# Altium PCB 数控电源.PcbDoc (part 1 of 4)
Units mm, origin at the board's own origin, x right, y up, seen from the top; angles counter-clockwise.
Board outline 99.32 x 99.37 mm, 4 copper layers (Top Layer 1, GND, POWER, Bottom Layer), stack 0.603 mm thick; 325 components, 180 nets, 929 pads, 616 vias.
Unrouted connection lines stored in the file: 13.
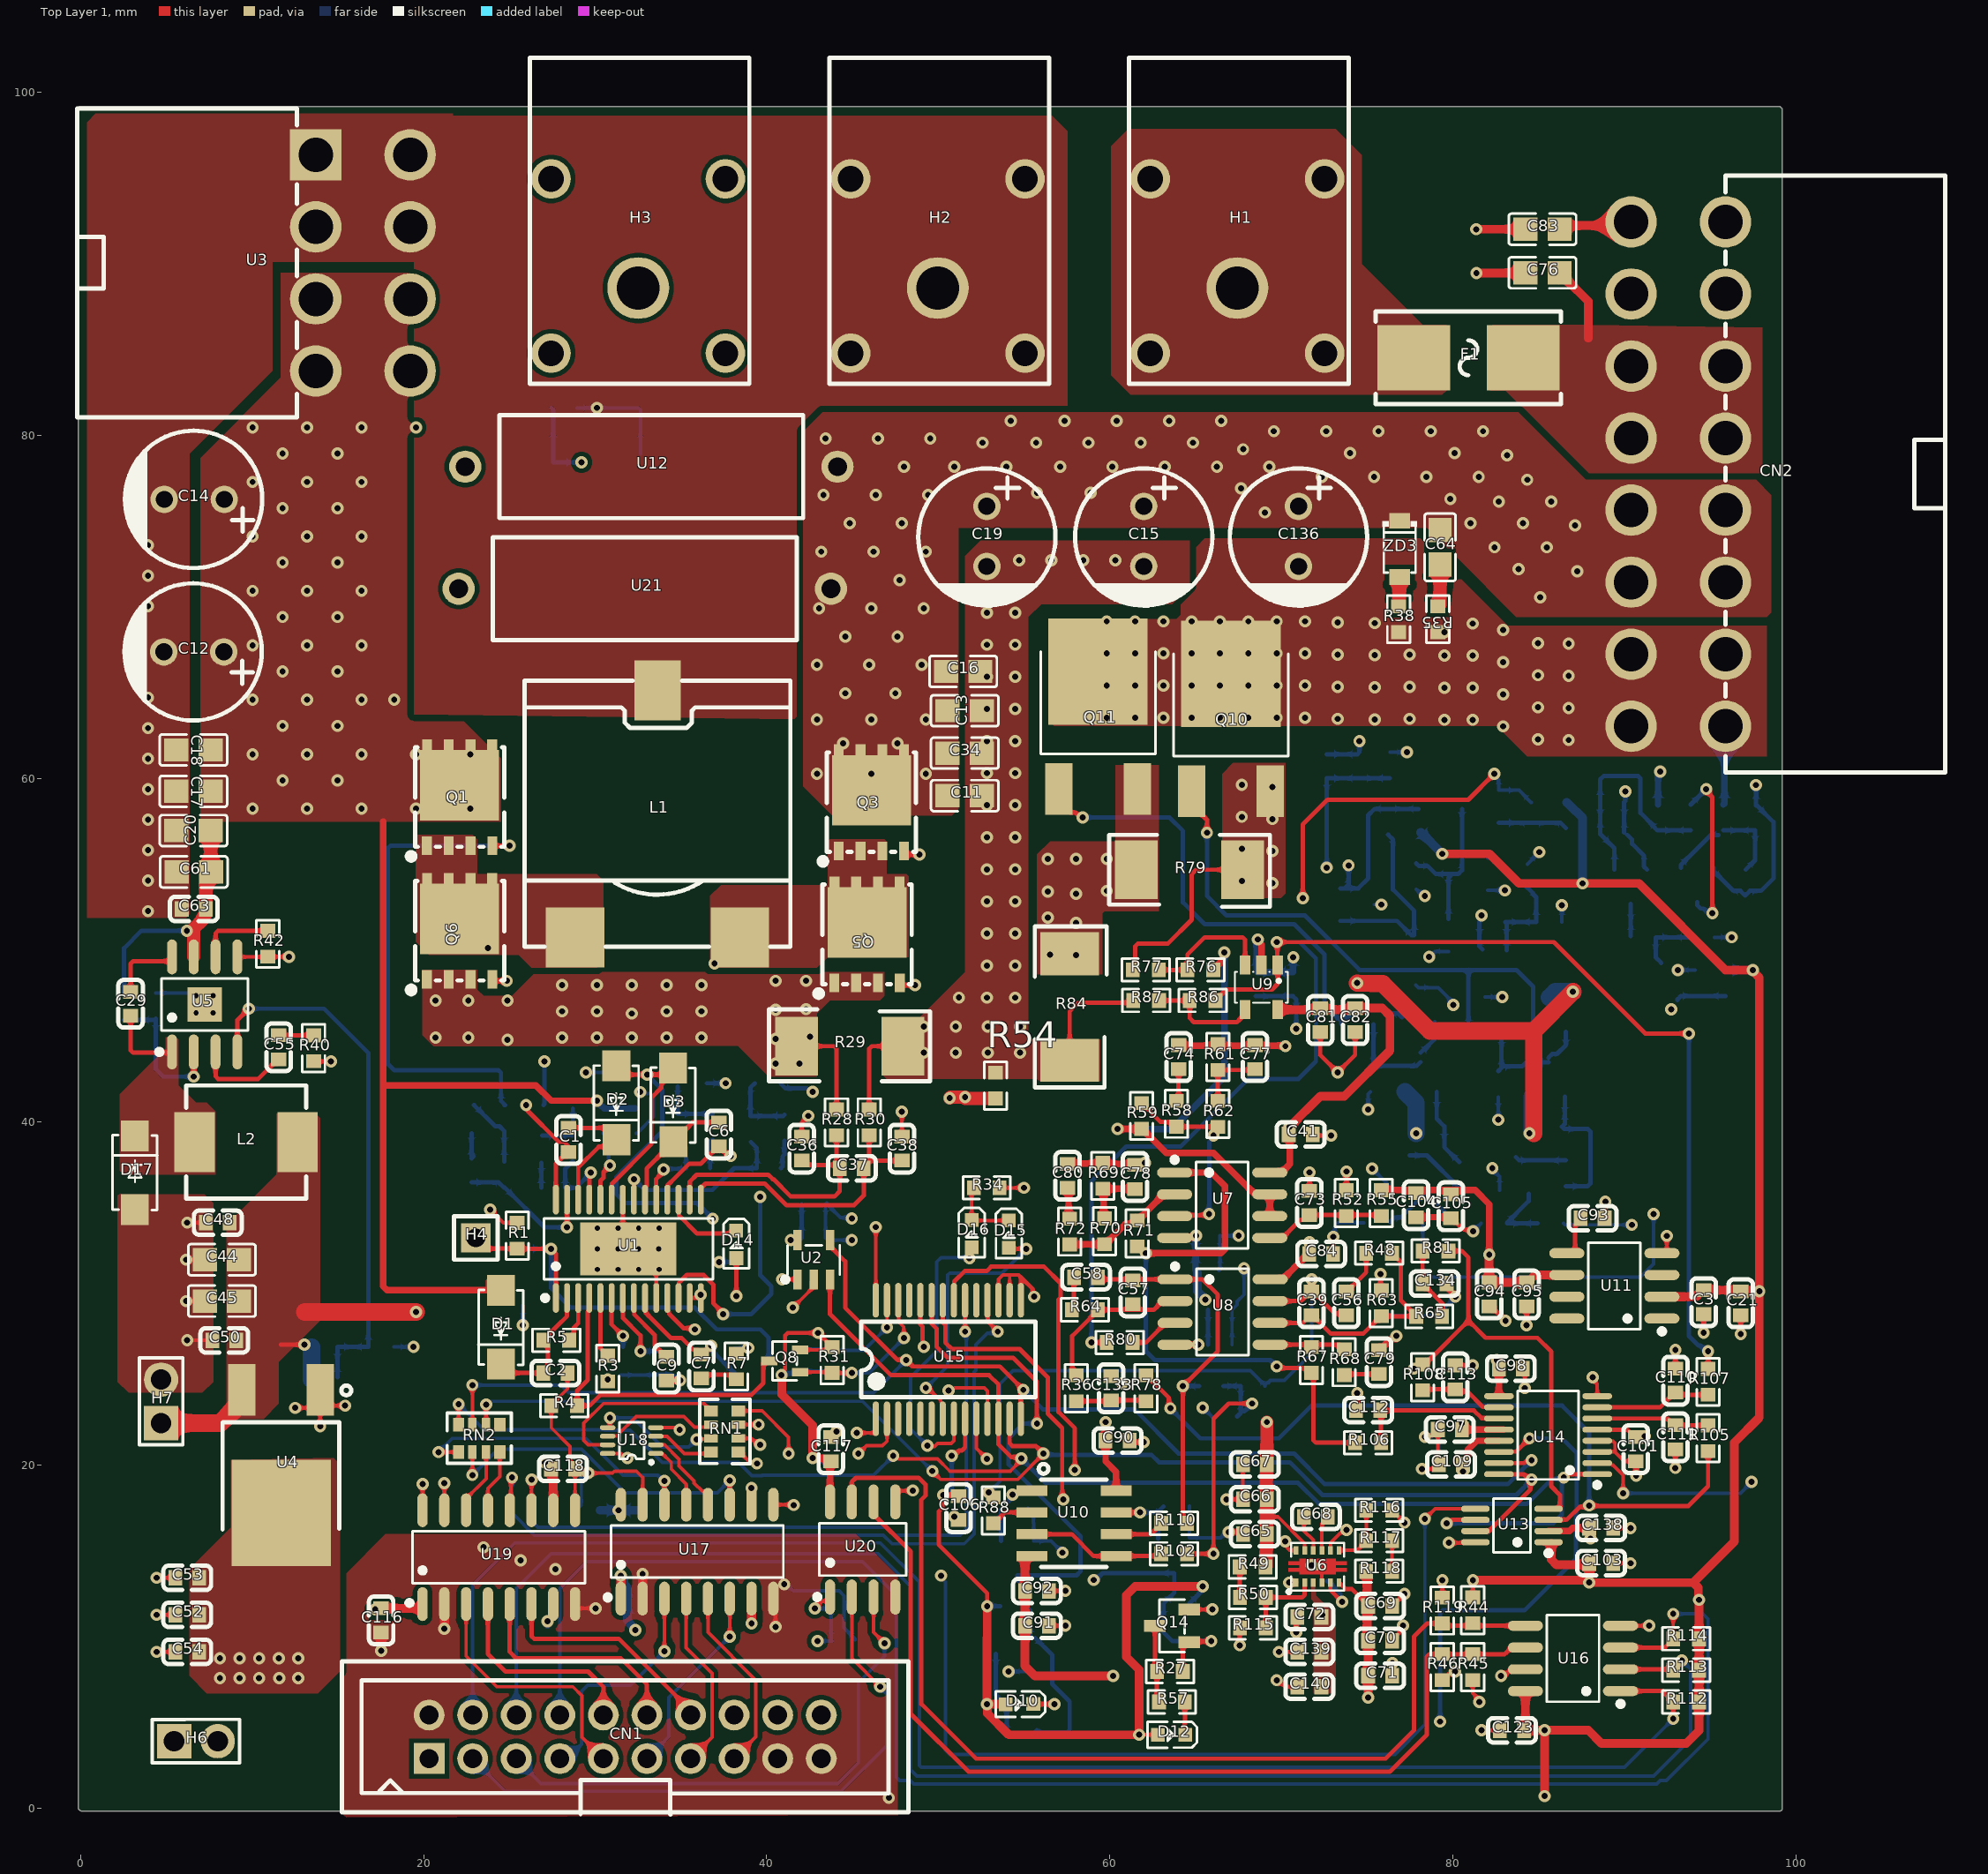
[diagram p0: Top Layer 1 view]
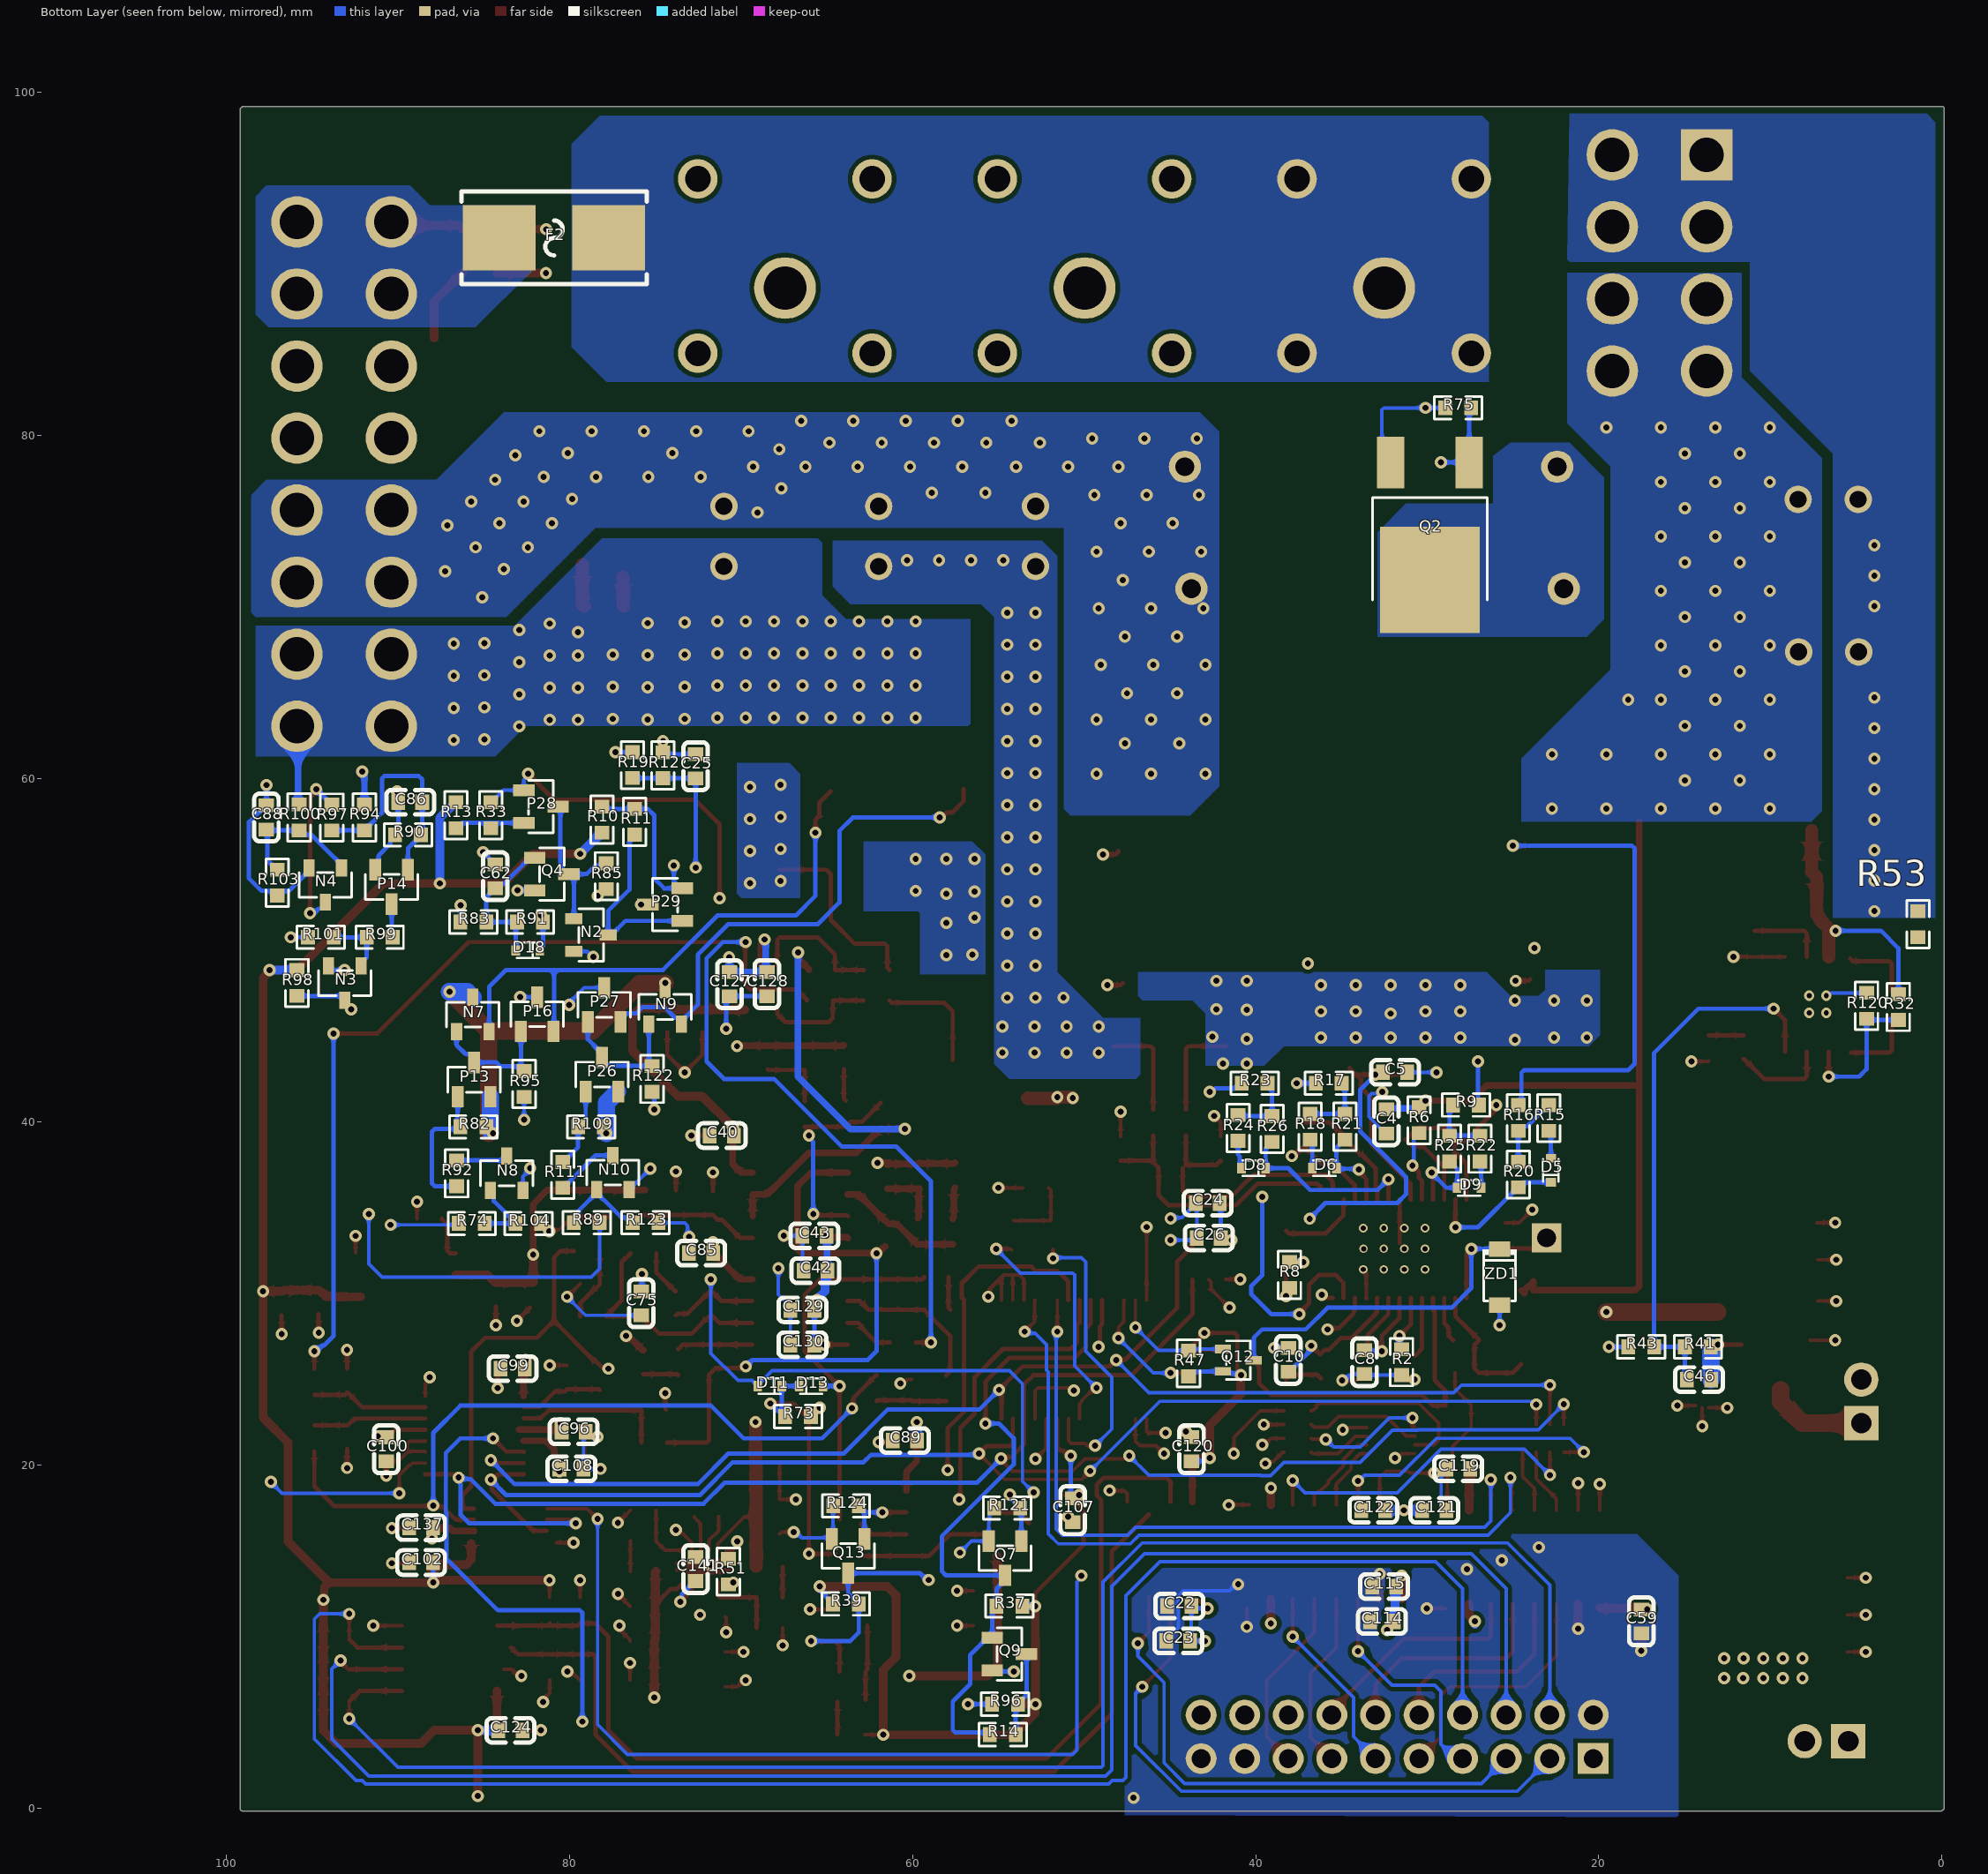
[diagram p1: Bottom Layer view, seen from below]
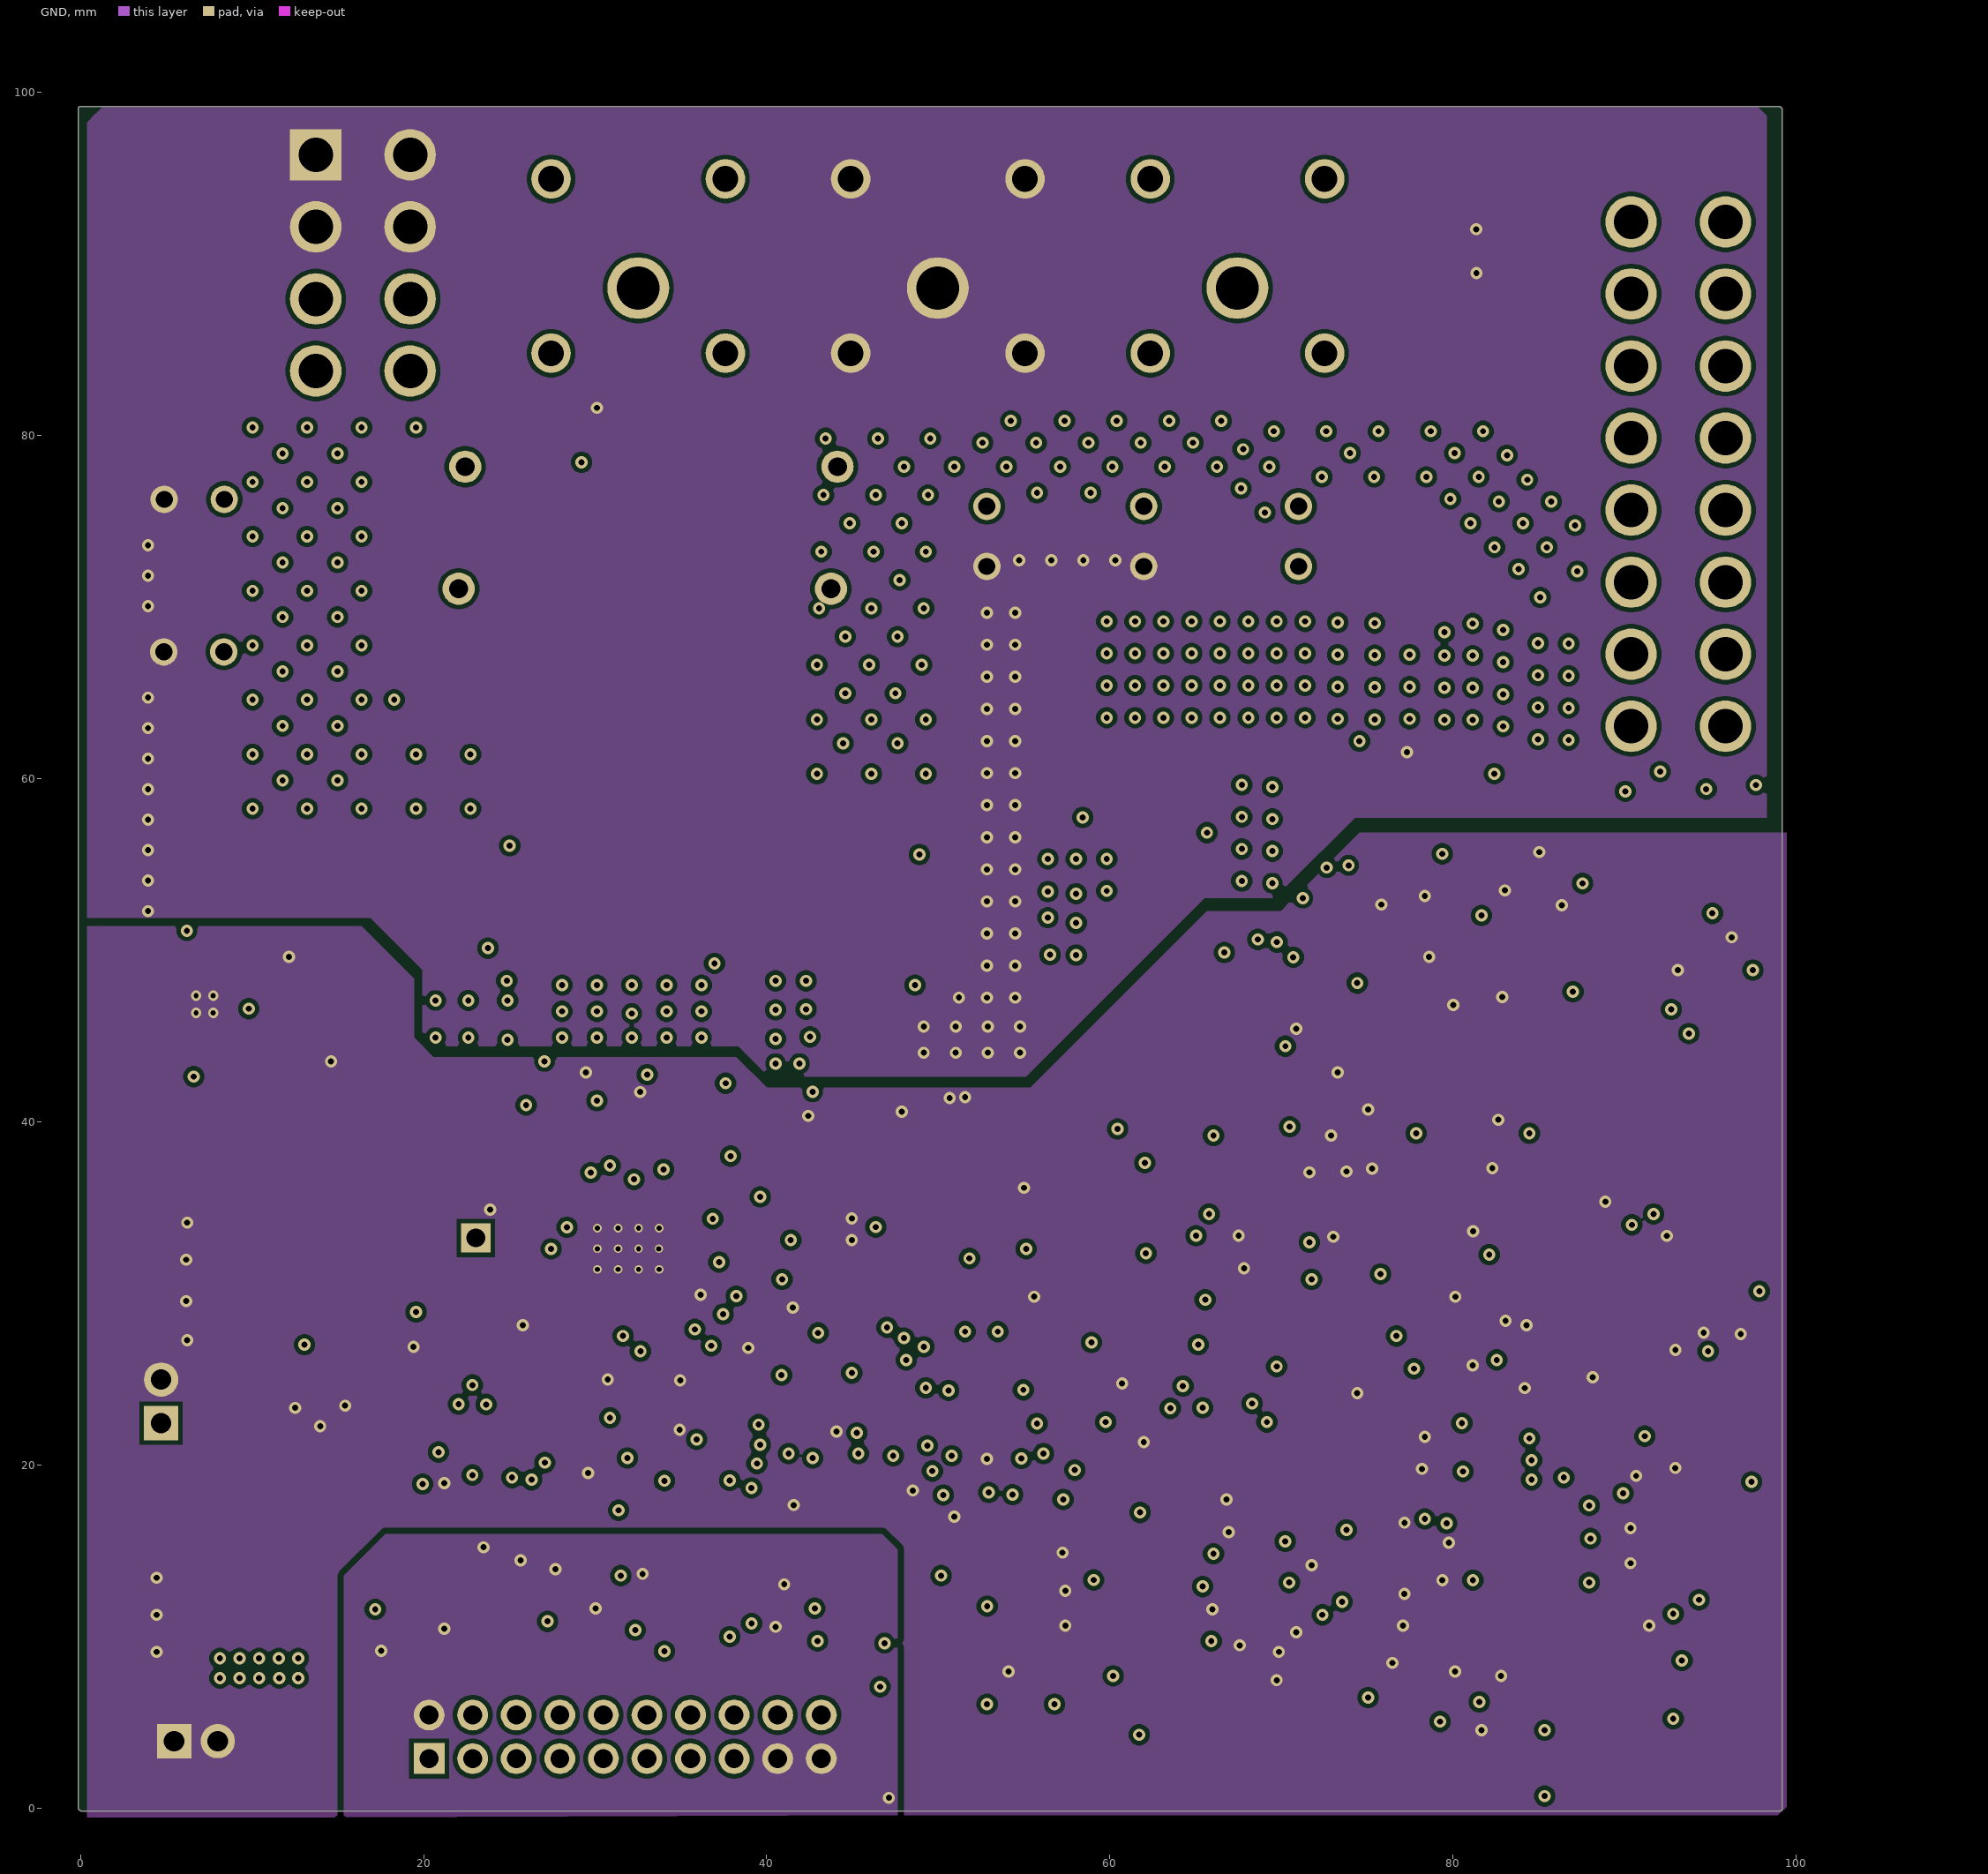
[diagram p2: GND]
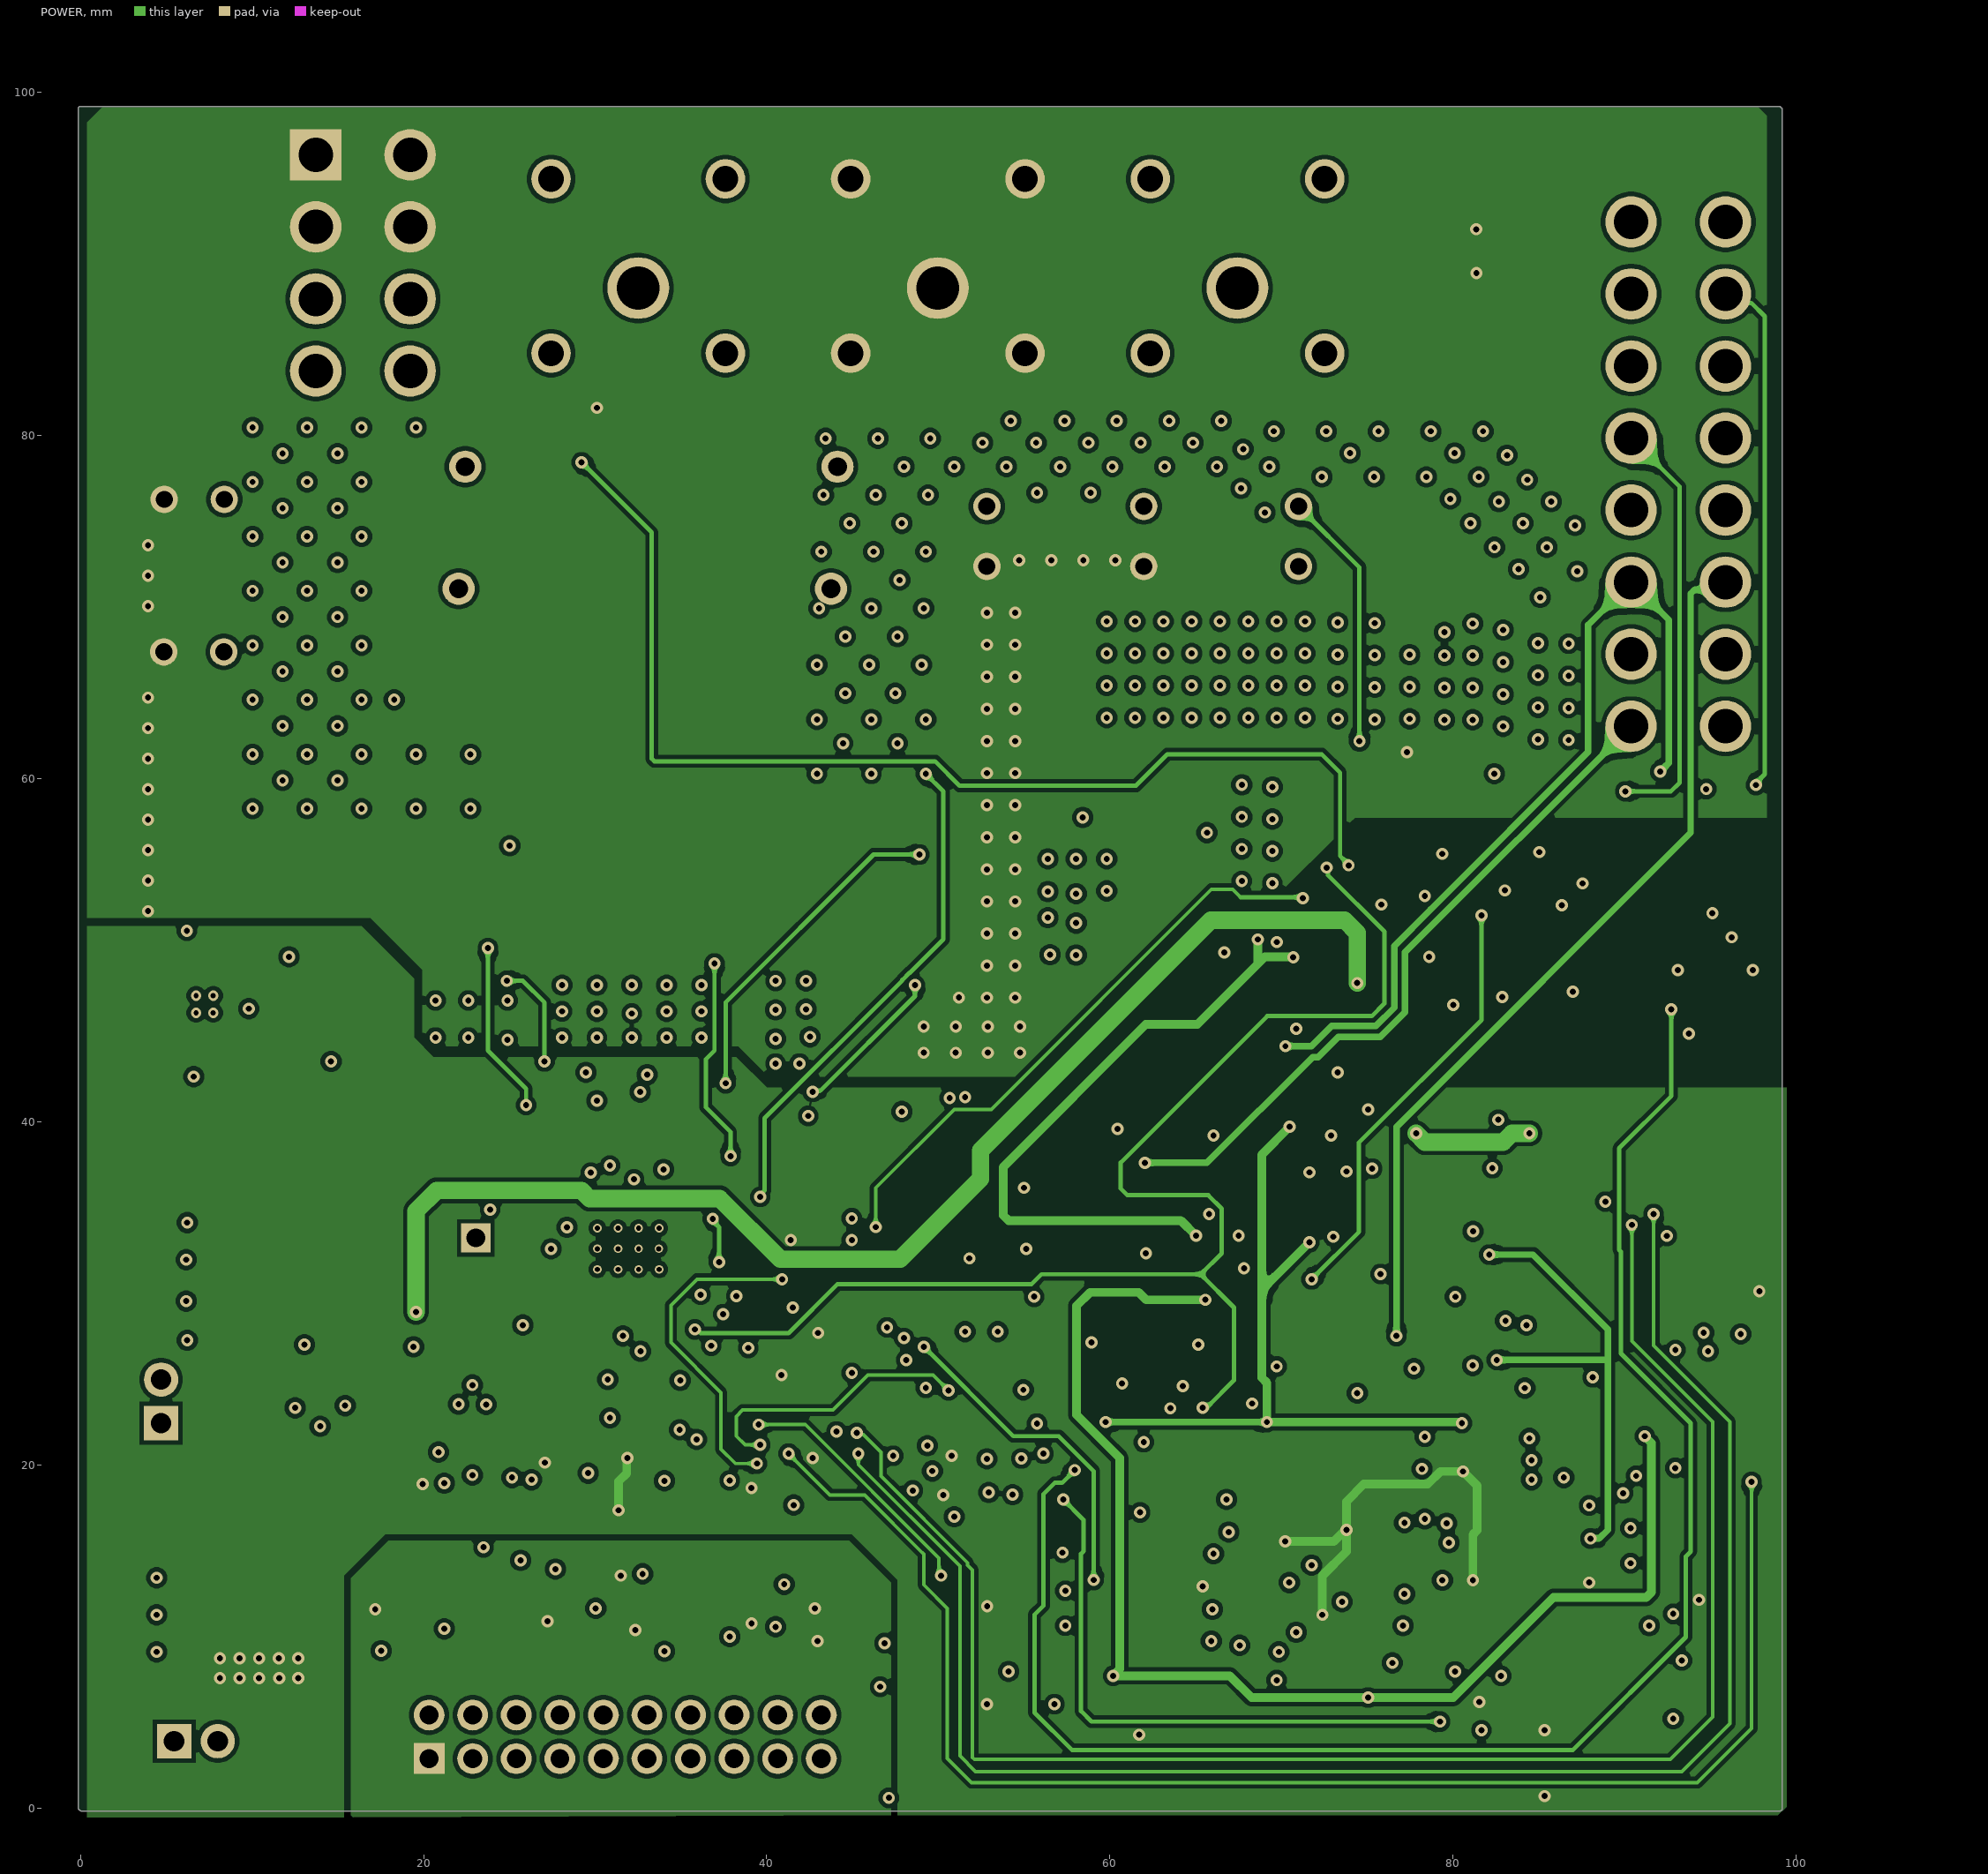
[diagram p3: POWER]

## Layer stack, top to bottom
Top Solder: solder mask 0.0102, Solder Resist, Dk 3.5
Top Layer 1: signal copper 0.035
Dielectric 2: prepreg 0.0711, PP-006, Dk 4.1
GND: signal copper 0.0356
Dielectric 1: dielectric 0.32, FR-4, Dk 4.8
POWER: signal copper 0.0356
Dielectric 3: prepreg 0.0711, PP-006, Dk 4.1
Bottom Layer: signal copper 0.035
Bottom Solder: solder mask 0.0102, Solder Resist, Dk 3.5

## Board outline
-0.048,-0.118 cw(c0,0) -0.127,0 -0.127,99 -0.122,99.035 cw(c0.001,99.067) 0.001,99.194 99.001,99.194 cw(c99.001,99.067) 99.109,99.134 cw(c99.061,99.016) 99.188,99.016 99.188,0.016 99.187,-0.051 cw(c99.06,-0.051) 99.06,-0.178 0.06,-0.178 cw(c0.06,-0.051)

## Design rules (kind name [scope] priority, off if disabled: settings)
Clearance [All] p1: gap=0.254 ignorepadtopadclearanceinfootprint=FALSE except(0.127: Text-Hole; 0.203: SMDPad-SMDPad SMDPad-THPad; 0.381: Fill-Fill Fill-Poly Fill-Region Poly-Poly Poly-Region Region-Region)
MinimumSolderMaskSliver [All] p1: minsoldermaskwidth=0
PlaneConnect [All] p1: planeconnectstyle=Direct reliefexpansion=0.508 reliefentries=4 reliefconductorwidth=0.254 reliefairgap=0.254
PolygonConnect [All] p1: connectstyle=Direct reliefconductorwidth=0.254 reliefentries=4 polygonreliefangle="90 Angle" airgapwidth=0.254
RoutingVias [All] p1: holewidth=0.356 width=0.711 viastyle="Through Hole" minholewidth=0.127 minwidth=0.356 maxholewidth=0.711 maxwidth=1.27
SilkToSilkClearance [All] p1: silktosilkclearance=0
SilkToSolderMaskClearance [IsPad] p1: minsilkscreentomaskgap=0 clearancetoexposedcopper=TRUE
SolderMaskExpansion [All] p1: expansion=0.102 istentingtop=FALSE
SupplyNets "Schematic Supply Nets_12" [InNet('VIN')] p1: voltage=0.000
SupplyNets "Schematic Supply Nets_8" [InNet('SENSE+')] p2: voltage=0.000
SupplyNets "Schematic Supply Nets_5" [InNet('SENSE-')] p3: voltage=0.000
SupplyNets "Schematic Supply Nets_11" [InNet('GNDA')] p4: voltage=0.000
SupplyNets "Schematic Supply Nets_10" [InNet('VCC')] p5: voltage=0.000
SupplyNets "Schematic Supply Nets_9" [InNet('+VREF')] p6: voltage=0.000
SupplyNets "Schematic Supply Nets_7" [InNet('+3.3V_A')] p7: voltage=0.000
SupplyNets "Schematic Supply Nets_6" [InNet('+3.3V')] p8: voltage=0.000
SupplyNets "Schematic Supply Nets_4" [InNet('GND')] p9: voltage=0.000
SupplyNets "Schematic Supply Nets_2" [InNet('AVDD')] p10: voltage=0.000
SupplyNets "Schematic Supply Nets_1" [InNet('AVSS')] p11: voltage=0.000
SupplyNets "Schematic Supply Nets" [InNet('+5V')] p12: voltage=0.000
Width [All] p1: maxlimit=1.016 minlimit=0.203 preferedwidth=0.254 minimp=50.000000 maximp=50.000000 favimp=50.000000
26 further rules are at their usual default settings.

## Classes and differential pairs
component class SMPS_POWER: C1 C2 C4 C5 C6 C7 C8 C9 C10 C11 C12 C13 C14 C15 C16 C17 C18 C19 C20 C25 C34 C36 C37 C38 D1 D2 D3 D5 D6 D8 D9 D14 H4 L1 Q1 Q3 Q5 Q6 Q8 Q12 R1 R2 R3 R4 R5 R6 R7 R8 R9 R12 R15 R16 R17 R18 R19 R20 R21 R22 R23 R24 R25 R26 R28 R29 R30 R31 R47 R53 R54 U1 U3 ZD1
component class DAC、ADC、IO_Espander: C3 C21 C24 C26 C93 C94 C95 C96 C97 C98 C99 C100 C101 C102 C103 C104 C105 C106 C107 C108 C109 C110 C111 C112 C113 C137 C138 D15 D16 H6 R34 R105 R106 R107 R108 U2 U11 U13 U14 U15
component class CC_CV_Indicators_and_sense_error: C86 C88 C89 C90 C91 C92 D10 D12 N3 N4 P14 Q7 Q9 Q13 Q14 R14 R27 R37 R39 R57 R88 R90 R94 R96 R97 R98 R99 R100 R101 R102 R103 R110 R121 R124 U10
component class CC_CV_Down-programmer: C39 C40 C41 C42 C43 C56 C57 C58 C62 C73 C74 C75 C77 C78 C79 C80 C81 C82 C84 C85 C127 C128 C129 C130 C133 C134 D11 D13 D18 M1 N2 N7 N8 N9 N10 P13 P16 P26 P27 P28 P29 Q2 Q4 Q10 Q11 R10 R11 R13 R33 R36 R48 R52 R55 R58 R59 R61 R62 R63 R64 R65 R67 R68 R69 R70 R71 R72 R73 R74 R75 R76 R77 R78 R79 R80 R81 R82 R83 R84 R85 R86 R87 R89 R91 R92 R95 R104 R109 R111 R122 R123 U7 U8 U9 U12 U21
component class "Bus isolators": C22 C23 C59 C64 C76 C83 C114 C115 C116 C117 C118 C119 C120 C121 C122 C123 C124 C136 CN1 CN2 F1 F2 H1 H2 H3 R35 R38 R44 R45 R46 R112 R113 R114 R119 RN1 RN2 U16 U17 U18 U19 U20 ZD3
component class Bias_Power_Supply: C29 C44 C45 C46 C48 C50 C52 C53 C54 C55 C61 C63 C65 C66 C67 C68 C69 C70 C71 C72 C139 C140 C141 D17 H7 L2 R32 R40 R41 R42 R43 R49 R50 R51 R115 R116 R117 R118 R120 U4 U5 U6

## Components (designator, comment, footprint, x,y, rotation, side; value= is the part's Value field where it differs from the comment)
C1 "100nF" C0603 28.449,38.945 r270 top value=104
C2 "1uF" C0603 27.687,25.356 r180 top value=104
C3 "1uF" C0603 94.616,29.485 r90 top value=104
C4 "100nF" C0603 32.386,40.026 r90 bottom value=104
C5 "1uF" C0603 31.878,42.882 r0 bottom value=104
C6 "100nF" C0603 37.212,39.261 r90 top value=104
C7 "22pF" C0603 36.196,25.737 r90 top value=104
C8 "296pF" C0603 33.656,25.991 r90 bottom value=104
C9 "0.47uF" C0603 34.164,25.61 r90 top value=104
C10 "0.39uF" C0603 38.101,26.118 r270 bottom value=104
C11 "1uF" C0805 51.545,59.011 r180 top value=104
C12 "220uF" CAP-TH_BD8.0-P3.50-D0.5-FD 6.605,67.393 r180 top
C13 "4.7uF" C0805 51.545,63.964 r180 top value=104
C14 "470uF" CAP-TH_BD8.0-P3.50-D0.5-FD 6.633,76.283 r180 top
C15 "220uF" CAP-TH_BD8.0-P3.50-D0.5-FD 61.977,74.124 r270 top
C16 "4.7uF" C0805 51.452,66.25 r180 top value=104
C17 "10uF" C0805 6.585,59.265 r0 top value=104
C18 "10uF" C0805 6.585,61.678 r0 top value=104
C19 "470uF" CAP-TH_BD8.0-P3.50-D0.5-FD 52.833,74.124 r270 top
C20 "10uF" C0805 6.589,56.979 r0 top value=104
C21 "0.1uF" C0603 96.775,29.42 r90 top value=104
C22 "0.1uF" C0603 44.451,11.767 r180 bottom value=104
C23 "0.1uF" C0603 44.513,9.735 r180 bottom value=104
C24 "1uF" C0603 42.8,35.262 r180 bottom value=104
C25 "220pF" C0603 72.645,60.727 r90 bottom value=104
C26 "0.1uF" C0603 42.735,33.23 r180 bottom value=104
C29 "0.1uF" C0603 2.922,46.881 r90 top value=104
C34 "4.7uF" C0805 51.545,61.488 r180 top value=104
C36 "47pF" C0603 42.038,38.437 r90 top value=104
C37 "47pF" C0603 44.959,37.294 r180 top value=104
C38 "47pF" C0603 47.88,38.437 r270 top value=104
C39 "33pF" C0603 71.756,29.42 r90 top value=104
C40 "1uF" C0603 71.121,39.199 r180 bottom value=104
C41 "0.1uF" C0603 71.128,39.26 r180 top value=104
C42 "1uF" C0603 65.66,31.325 r180 bottom value=104
C43 "0.1uF" C0603 65.725,33.357 r180 bottom value=104
C44 "4.7uF" C0805 8.245,31.96 r0 top value=104
C45 "47uF" C0805 8.245,29.547 r0 top value=104
C46 "220pF" C0603 14.16,24.975 r0 bottom value=104
C48 "0.1uF" C0603 8.002,34.119 r0 top value=104
C50 "1uF" C0603 8.383,27.261 r0 top value=104
C52 "10uF" C0603 6.224,11.259 r0 top value=104
C53 "1uF" C0603 6.224,13.418 r0 top value=104
C54 "0.1uF" C0603 6.224,9.1 r0 top value=104
C55 "150pF" C0603 11.558,44.344 r270 top value=104
C56 "120pF" C0603 73.788,29.42 r270 top value=104
C57 "33pF" C0603 61.342,30.055 r90 top value=104
C58 "4n7F" C0603 58.613,30.944 r0 top value=104
C59 "0.1uF" C0603 17.527,10.878 r90 bottom value=104
C61 "10uF" C0805 6.605,54.566 r0 top value=104
C62 "2.2nF" C0603 84.329,54.312 r90 bottom value=104
C63 "1uF" C0603 6.605,52.407 r0 top value=104
C64 "470pF" C0805 79.249,73.489 r90 top value=104
C65 "0.1uF" C0603 68.454,15.958 r0 top value=104
C66 "1uF" C0603 68.454,17.99 r0 top value=104
C67 "10uF" C0603 68.454,20.022 r0 top value=104
C68 "1uF" C0603 72.01,16.974 r180 top value=104
C69 "0.1uF" C0603 75.755,11.767 r0 top value=104
C70 "1uF" C0603 75.755,9.735 r0 top value=104
C71 "10uF" C0603 75.755,7.703 r0 top value=104
C72 "10uF" C0603 71.629,11.132 r0 top value=104
C73 "100nF" C0603 71.629,35.262 r90 top value=104
C74 "47pF" C0603 64.009,43.771 r270 top value=104
C75 "2.2nF" C0603 75.82,29.42 r90 bottom value=104
C76 "50nF" C0805 85.218,89.491 r0 top value=104
C77 "2.2nF" C0603 68.454,43.771 r270 top value=104
C78 "2.2nF" C0603 61.469,36.786 r270 top value=104
C79 "2.2nF" C0603 75.693,25.991 r270 top value=104
C80 "47pF" C0603 57.532,36.851 r270 top value=104
C81 "1uF" C0603 72.264,45.93 r90 top value=104
C82 "0.1uF" C0603 74.296,45.93 r90 top value=104
C83 "50nF" C0805 85.218,92.031 r180 top value=104
C84 "1uF" C0603 72.319,32.289 r180 top value=104
C85 "0.1uF" C0603 72.326,32.341 r180 bottom value=104
C86 "10nF" C0603 89.282,58.63 r0 bottom value=104
C88 "10nF" C0603 97.664,57.741 r270 bottom value=104
C89 "1uF" C0603 60.453,21.419 r180 bottom value=104
C90 "1uF" C0603 60.453,21.419 r180 top value=104
C91 "1uF" C0603 55.754,10.624 r180 top value=104
C92 "0.1uF" C0603 55.754,12.656 r180 top value=104
C93 "1uF" C0603 88.139,34.373 r180 top value=104
C94 "10uF" C0603 82.107,29.935 r90 top value=104
C95 "1uF" C0603 84.289,29.935 r90 top value=104
C96 "1uF" C0603 79.757,21.927 r0 bottom value=104
C97 "0.1uF" C0603 79.819,22.054 r0 top value=104
C98 "0.1uF" C0603 83.375,25.61 r180 top value=104
C99 "1uF" C0603 83.313,25.61 r180 bottom value=104
C100 "1uF" C0603 90.679,20.911 r90 bottom value=104
C101 "0.1uF" C0603 90.65,20.918 r90 top value=104
C102 "1uF" C0603 88.647,14.307 r180 bottom value=104
C103 "0.1uF" C0603 88.64,14.278 r180 top value=104
C104 "0.1uF" C0603 77.852,35.135 r90 top value=104
C105 "1uF" C0603 79.884,35.073 r90 top value=104
C106 "1uF" C0603 51.182,17.482 r90 top value=104
C107 "0.1uF" C0603 50.674,17.355 r90 bottom value=104
C108 "1uF" C0603 79.884,19.768 r0 bottom value=104
C109 "0.1uF" C0603 79.884,20.022 r0 top value=104
C110 "3.3nF" C0603 92.965,24.91 r270 top value=104
C111 "3.3nF" C0603 92.965,21.608 r90 top value=104
C112 "3.3nF" C0603 75.058,23.197 r0 top value=104
C113 "3.3nF" C0603 80.138,25.102 r270 top value=104
C114 "0.1uF" C0603 32.64,10.878 r180 bottom value=104
C115 "0.1uF" C0603 32.513,12.91 r180 bottom value=104
C116 "0.1uF" C0603 17.527,10.94 r90 top value=104
C117 "1uF" C0603 43.735,20.914 r270 top value=104
C118 "0.1uF" C0603 28.13,19.768 r180 top value=104
C119 "1uF" C0603 28.195,19.768 r180 bottom value=104
C120 "0.1uF" C0603 43.735,20.914 r270 bottom value=104
C121 "0.1uF" C0603 29.592,17.355 r0 bottom value=104
C122 "0.1uF" C0603 33.148,17.355 r180 bottom value=104
C123 "0.1uF" C0603 83.44,4.528 r0 top value=104
C124 "0.1uF" C0603 83.44,4.528 r0 bottom value=104
C127 "1uF" C0603 70.675,48.018 r90 bottom value=104
C128 "0.1uF" C0603 68.493,48.018 r90 bottom value=104
C129 "1uF" C0603 66.422,29.039 r180 bottom value=104
C130 "0.1uF" C0603 66.422,27.007 r180 bottom value=104
C133 "0.1uF" C0603 60.072,24.467 r90 top value=104
C134 "0.1uF" C0603 78.933,30.563 r0 top value=104
C136 "470uF/60V" CAP-TH_BD8.0-P3.50-D0.5-FD 70.994,74.124 r270 top
C137 "100nF" C0603 88.647,16.339 r180 bottom value=104
C138 "100nF" C0603 88.64,16.326 r180 top value=104
C139 "1uF" C0603 71.629,9.1 r0 top value=104
C140 "0.1uF" C0603 71.629,7.068 r0 top value=104
C141 "10uF" C0603 72.645,13.926 r270 bottom value=104
CN1 "sbh11-pbpc-d10-st-bk" IDC-TH_20P-P2.54-V-R2-C10-S2.54 31.751,4.147 r0 top
CN2 "c4201wr-2x8p" CONN-TH_C4201WR-2X8P 93.136,77.757 r270 top
D1 "ss34" SMA_L4.3-W2.6-LS5.0-FD 24.512,28.023 r270 top
D2 "ss16" SMA_L4.3-W2.6-LS5.0-FD 31.243,41.104 r270 top
D3 "ss16" SMA_L4.3-W2.6-LS5.0-FD 34.545,40.977 r270 top
D5 "1N4148WT" SOD-523_L1.2-W0.8-LS1.6-FD 22.79,37.169 r270 bottom
D6 "1N4148WT" SOD-523_L1.2-W0.8-LS1.6-FD 35.998,37.296 r180 bottom
D8 "1N4148WT" SOD-523_L1.2-W0.8-LS1.6-FD 40.125,37.296 r180 bottom
D9 "1N4148WT" SOD-523_L1.2-W0.8-LS1.6-FD 27.56,36.151 r0 bottom
D10 "DIO_LED" LED0603-RD_RED 54.738,6.052 r180 top
D11 "1N4148WT" SOD-523_L1.2-W0.8-LS1.6-FD 68.327,24.594 r180 bottom
D12 "DIO_LED" LED0603-RD_RED 63.59,4.271 r180 top
D13 "1N4148WT" SOD-523_L1.2-W0.8-LS1.6-FD 65.914,24.594 r0 bottom
D14 "DIO_LED" LED0603-RD_RED 38.228,32.849 r270 top
D15 "DIO_LED" LED0603-RD_RED 54.106,33.446 r270 top
D16 "DIO_LED" LED0603-RD_RED 51.944,33.484 r270 top
D17 "ss34" SMA_L4.3-W2.6-LS5.0-FD 3.168,37.032 r90 top
D18 "1N4148WT" SOD-523_L1.2-W0.8-LS1.6-FD 82.424,49.994 r180 bottom
F1 "xf-155" FUSE-SMD_L10.5-W5.1 80.9,84.538 r180 top
F2 "xf-155" FUSE-SMD_L10.5-W5.1 80.9,91.523 r180 bottom
H1 "4mm香蕉座" 4mmbanana 67.438,88.602 r270 top
H2 "4mm香蕉座" 4mmbanana 49.975,88.602 r270 top
H3 "4mm香蕉座" 4mmbanana 32.513,88.602 r270 top
H4 "PZ254V-11-01P" HDR-TH_1P-P2.54-V-M 23.044,33.232 r0 top
H6 "pz254v-11-02p" HDR-TH_2P-P2.54-V-M 6.732,3.893 r0 top
H7 "pz254v-11-02p" HDR-TH_2P-P2.54-V-M 4.7,23.705 r90 top
L1 "3.7UH" IND-SMD_3P-L15.5-W15.5-L 33.63,57.957 r270 top value=4.7uH
L2 "fxl0630-100-m" IND-SMD_L7.3-W6.8 9.653,38.818 r0 top value=10uH
N2 "MMTB3904" "SOT-23-3_L2.9-W1.3-P1.90-LS2.4-BR - duplicate" 78.741,50.883 r0 bottom
N3 "MMTB3904" "SOT-23-3_L2.9-W1.3-P1.90-LS2.4-BR - duplicate" 93.092,48.089 r90 bottom
N4 "MMTB3904" "SOT-23-3_L2.9-W1.3-P1.90-LS2.4-BR - duplicate" 94.235,53.804 r90 bottom
N7 "MMTB3904" "SOT-23-3_L2.9-W1.3-P1.90-LS2.4-BR - duplicate" 85.63,46.25 r270 bottom
N8 "MMTB3904" "SOT-23-3_L2.9-W1.3-P1.90-LS2.4-BR - duplicate" 83.659,36.997 r270 bottom
N9 "MMTB3904" "SOT-23-3_L2.9-W1.3-P1.90-LS2.4-BR - duplicate" 74.423,46.692 r270 bottom
N10 "MMTB3904" "SOT-23-3_L2.9-W1.3-P1.90-LS2.4-BR - duplicate" 77.471,37.04 r270 bottom
P13 "MMBT3906" SOT-23-3_L2.9-W1.3-P1.90-LS2.4-BR 85.564,42.458 r270 bottom
P14 "MMBT3906" SOT-23-3_L2.9-W1.3-P1.90-LS2.4-BR 90.364,53.693 r90 bottom
P16 "MMBT3906" SOT-23-3_L2.9-W1.3-P1.90-LS2.4-BR 81.881,46.268 r270 bottom
P26 "MMBT3906" SOT-23-3_L2.9-W1.3-P1.90-LS2.4-BR 78.106,42.755 r270 bottom
P27 "MMBT3906" SOT-23-3_L2.9-W1.3-P1.90-LS2.4-BR 77.979,46.819 r270 bottom
P28 "MMBT3906" SOT-23-3_L2.9-W1.3-P1.90-LS2.4-BR 81.662,58.376 r0 bottom
P29 "MMBT3906" SOT-23-3_L2.9-W1.3-P1.90-LS2.4-BR 74.423,52.661 r180 bottom
Q1 "APG077N01G" PDFN-8_L5.8-W5.1-P1.27-LS6.1-BL 22.099,58.925 r0 top
Q2 "50n04" TO-252-2_L6.6-W6.1-P4.57-LS9.9-BR-CW 29.846,75.013 r90 bottom
Q3 "APG077N01G" PDFN-8_L5.8-W5.1-P1.27-LS6.1-BL 46.102,58.63 r0 top
Q4 "2n7002" SOT-23-3_L2.9-W1.3-P1.90-LS2.4-BR 81.027,54.439 r0 bottom
Q5 "APG077N01G" PDFN-8_L5.8-W5.1-P1.27-LS6.1-BL 45.848,50.924 r0 top
Q6 "APG077N01G" PDFN-8_L5.8-W5.1-P1.27-LS6.1-BL 22.099,51.137 r0 top
Q7 "2n7002" SOT-23-3_L2.9-W1.3-P1.90-LS2.4-BR 54.611,14.561 r90 bottom
Q8 "bss84pw(tp)" SOT-323-3_L2.0-W1.3-P1.30-LS2.1-BR 41.044,26.057 r0 top
Q9 "2n7002" SOT-23-3_L2.9-W1.3-P1.90-LS2.4-BR 54.357,8.973 r0 bottom
Q10 "50n04" TO-252-2_L6.6-W6.1-P4.57-LS9.9-BR-CW 67.057,62.694 r270 top
Q11 "50n04" TO-252-2_L6.6-W6.1-P4.57-LS9.9-BR-CW 59.31,62.821 r270 top
Q12 "bss84pw(tp)" SOT-323-3_L2.0-W1.3-P1.30-LS2.1-BR 41.014,26.103 r0 bottom
Q13 "2n7002" SOT-23-3_L2.9-W1.3-P1.90-LS2.4-BR 63.755,14.688 r90 bottom
Q14 "2n7002" SOT-23-3_L2.9-W1.3-P1.90-LS2.4-BR 63.628,10.624 r0 top
R1 "10KΩ" R0603 25.457,33.359 r90 top
R2 "20KΩ" R0603 31.497,25.991 r270 bottom
R3 "0Ω" R0603 30.735,25.61 r270 top
R4 "93.1KΩ" R0603 28.195,23.451 r180 top
R5 "2KΩ" R0603 27.734,27.263 r0 top
R6 "10R" R0603 30.481,40.088 r90 bottom
R7 "12.1KΩ" R0603 38.228,25.737 r270 top
R8 "10KΩ" R0603 38.03,31.073 r90 bottom
R9 "0" R0603 27.743,40.979 r0 bottom
R10 "4.7KΩ" R0603 78.106,57.614 r270 bottom
R11 "100KΩ" R0603 76.201,57.487 r90 bottom
R12 "226K" R0603 74.55,60.78 r90 bottom
R13 "10KΩ" R0603 86.615,57.868 r90 bottom
R14 "100K" R0603 54.738,4.274 r0 bottom
R15 "5Ω" R0603 22.917,40.217 r270 bottom
R16 "0" R0603 24.695,40.217 r270 bottom
R17 "0" R0603 35.744,42.249 r0 bottom
R18 "5Ω" R0603 36.831,39.707 r270 bottom
R19 "0603-5KΩ-5%" R0603 76.328,60.789 r270 bottom
R20 "10Ω" R0603 24.695,36.923 r270 bottom
R21 "10Ω" R0603 34.799,39.707 r270 bottom
R22 "5Ω" R0603 26.925,38.437 r270 bottom
R23 "0" R0603 40.062,42.249 r0 bottom
R24 "5Ω" R0603 41.026,39.644 r270 bottom
R25 "10Ω" R0603 28.703,38.437 r270 bottom
R26 "10Ω" R0603 39.046,39.582 r270 bottom
R27 "100K" R0603 63.501,7.957 r0 top
R28 "100Ω" R0603 44.07,39.961 r270 top
R29 "5mΩ" RES-SMD_L6.4-W3.2-1 44.832,44.406 r180 top value=2mΩ
R30 "100Ω" R0603 45.975,39.961 r270 top
R31 "100kR" R0603 43.816,26.118 r270 top
R32 "0603-30KΩ-5%" R0603 2.541,46.692 r270 bottom
R33 "100KΩ" R0603 84.583,57.868 r270 bottom
R34 "470R" R0603 52.824,36.151 r0 top
R35 "1R" R0603 79.122,69.298 r90 top
R36 "2.2K" R0603 58.04,24.467 r270 top
R37 "4.7K" R0603 54.357,11.767 r0 bottom
R38 "1KR" R0603 76.836,69.298 r90 top
R39 "4.7K" R0603 63.89,11.894 r180 bottom
R40 "100k" R0603 13.59,44.288 r270 top
R41 "210k" R0603 14.225,26.88 r0 bottom
R42 "100k" R0603 10.923,50.375 r90 top
R43 "40.2k" R0603 17.527,26.88 r0 bottom
R44 "5.1K" R0603 81.154,11.522 r90 top
R45 "5.1K" R0603 81.154,8.211 r270 top
R46 "1M" R0603 79.376,8.211 r270 top
R47 "100kR" R0603 43.913,25.915 r90 bottom
R48 "0" R0603 75.693,32.341 r0 top
R49 "249K" R0603 68.327,14.053 r0 top
R50 "7.5K" R0603 68.335,12.275 r180 top
R51 "0" R0603 70.735,13.779 r90 bottom
R52 "220R" R0603 73.788,35.262 r270 top
R53 "0R" R0603 1.398,51.518 r90 bottom
R54 "0R" R0603 53.341,42.111 r90 top
R55 "10K" R0603 75.82,35.262 r90 top
R57 "1K" R0603 63.619,6.179 r180 top
R58 "10K" R0603 63.882,40.469 r90 top
R59 "7.5K" R0603 61.85,40.342 r90 top
R61 "24K" R0603 66.295,43.771 r90 top
R62 "100K" R0603 66.295,40.46 r90 top
R63 "220R" R0603 75.82,29.42 r90 top
R64 "8.2k" R0603 58.548,29.039 r0 top
R65 "2.2K" R0603 78.614,28.658 r0 top
R67 "10K" R0603 71.756,26.118 r270 top
R68 "220R" R0603 73.661,25.991 r270 top
R69 "24K" R0603 59.585,36.849 r90 top
R70 "100K" R0603 59.691,33.611 r90 top
R71 "7.5K" R0603 61.596,33.493 r90 top
R72 "10K" R0603 57.659,33.602 r90 top
R73 "1K" R0603 66.676,22.816 r0 bottom
R74 "2K" R0603 85.691,34.076 r180 bottom
R75 "100KΩ" R0603 28.195,81.617 r180 bottom
R76 "36K" R0603 65.279,48.851 r180 top
R77 "820R" R0603 62.095,48.851 r180 top
R78 "2.2K" R0603 62.104,24.467 r90 top
R79 "100mR" RES-SMD_L6.4-W3.2-1 64.644,54.693 r0 top value=2mΩ
R80 "10K" R0603 60.571,27.134 r180 top
R81 "2.2K" R0603 78.986,32.468 r0 top
R82 "2K" R0603 85.599,39.707 r0 bottom
R83 "100KΩ" R0603 85.599,51.645 r0 bottom
R84 "5mR" RES-SMD_L6.4-W3.2-1 57.659,46.692 r90 top value=2mΩ
R85 "100KΩ" R0603 77.852,54.312 r90 bottom
R86 "36K" R0603 65.406,47.073 r0 top
R87 "820R" R0603 62.112,47.073 r180 top
R88 "10K" R0603 53.214,17.346 r270 top
R89 "2K" R0603 78.995,34.119 r0 bottom
R90 "330R" R0603 89.409,56.725 r0 bottom
R91 "4.7KΩ" R0603 82.297,51.645 r0 bottom
R92 "4.7K" R0603 86.58,36.997 r90 bottom
R94 "750R" R0603 91.949,57.741 r270 bottom
R95 "10K" R0603 82.643,42.204 r270 bottom
R96 "1K" R0603 54.611,6.052 r180 bottom
R97 "3.3KR" R0603 93.854,57.732 r90 bottom
R98 "10K" R0603 95.886,48.089 r90 bottom
R99 "10K" R0603 91.06,50.756 r180 bottom
R100 "750R" R0603 95.759,57.741 r270 bottom
R101 "47K" R0603 94.489,50.756 r180 bottom
R102 "10K" R0603 63.746,14.815 r180 top
R103 "330R" R0603 97.029,53.94 r270 bottom
R104 "100K" R0603 82.389,34.076 r180 bottom
R105 "220R" R0603 94.87,21.555 r90 top
R106 "220R" R0603 75.058,21.292 r180 top
R107 "220R" R0603 94.87,24.839 r270 top
R108 "220R" R0603 78.233,25.102 r90 top
R109 "2K" R0603 78.741,39.707 r0 bottom
R110 "10K" R0603 63.746,16.593 r180 top
R111 "4.7K" R0603 80.392,36.904 r270 bottom
R112 "10K" R0603 93.591,6.179 r0 top
R113 "10K" R0603 93.591,8.033 r0 top
R114 "10K" R0603 93.591,9.862 r0 top
R115 "237K" R0603 68.335,10.497 r0 top
R116 "237K" R0603 75.699,17.355 r0 top
R117 "1K" R0603 75.699,15.577 r180 top
R118 "249K" R0603 75.699,13.799 r0 top
R119 "1M" R0603 79.376,11.513 r90 top
R120 "0603-5KΩ-5%" R0603 4.392,46.758 r90 bottom
R121 "100K" R0603 54.484,17.482 r0 bottom
R122 "10K" R0603 75.185,42.501 r270 bottom
R123 "100K" R0603 75.566,34.119 r180 bottom
R124 "100K" R0603 63.882,17.609 r0 bottom
RN1 "4d03wgj0330t5e" RES-ARRAY-SMD_0603-8P-L3.2-W1.6-BL 37.555,21.947 r270 top value=33Ω
RN2 "4d03wgj0330t5e" RES-ARRAY-SMD_0603-8P-L3.2-W1.6-BL 23.242,21.546 r0 top value=33Ω
U1 "lm5176pwpr" HTSSOP-28_L9.7-W4.4-P0.65-LS6.4-BL-EP 31.934,32.597 r0 top
U2 "tc77-3.3mcttr" SOT-23-5_L3.0-W1.7-P0.95-LS2.8-BL 42.734,31.949 r0 top
U3 "c4201wr-2x4p_c5333418" CONN-TH_8P-P4.20_CJT_C4201WR-2X4P 16.467,90.067 r270 top
U4 "uz1085l-33-tn3-r" TO-252-2_L6.6-W6.1-P4.58-TL 11.685,20.784 r270 top
U5 "mp1584en-lf-z" SOIC-8_L5.0-W4.0-P1.27-LS6.0-BL-EP2.0 7.24,46.844 r0 top
U6 "lm27762dssr" WSON-12_L3.0-W2.0-P0.50-BL-EP 72.109,14.078 r0 top
U7 "opa2192idr" SOIC-8_L4.9-W3.9-P1.27-LS6.0-BL 66.549,35.135 r270 top
U8 "opa2376aidr" SOIC-8_L4.9-W3.9-P1.27-LS6.0-BL 66.57,28.912 r270 top
U9 "opa388qdbvrq1" SOT-23-5_L3.0-W1.7-P0.95-LS2.8-BR 68.835,47.835 r90 top
U10 "lm293d" SO-8_L4.9-W3.9-P1.27-LS6.0-BL 57.913,16.593 r270 top
U11 "ref5025idr" SOIC-8_L4.9-W3.9-P1.27-LS6.0-BL 89.409,30.436 r90 top
U12 "mof5ws-100Ω±5%t" RES-TH_BD6.0-L17.5-P21.50-D0.7 33.275,78.188 r0 top value=100Ω
U13 "dac8552idgkr" VSSOP-8_L3.0-W3.0-P0.65-LS5.0-BL 83.44,16.466 r90 top
U14 "ads1120ipwr" TSSOP-16_L5.0-W4.4-P0.65-LS6.4-BL 85.545,21.729 r90 top
U15 "mcp23s17-e/ss" SSOP-28_L10.2-W5.3-P0.65-LS7.8-BL 50.587,26.143 r0 top
U16 "m24c32-wmn6p" SOIC-8_L4.9-W3.9-P1.27-LS6.0-BL 86.996,8.719 r90 top
U17 "si8641bb-b-is1r" SOIC-16_L9.9-W3.9-P1.27-LS6.0-BL 35.942,14.942 r0 top
U18 "sn74lvc1g139dcur" VSSOP-8_L2.3-W2.0-P0.50-LS3.1-BL 32.132,21.419 r90 top
U19 "si8641bb-b-is1r" SOIC-16_L9.9-W3.9-P1.27-LS6.0-BL 24.385,14.62 r0 top
U20 "iso1540dr" SOIC-8_L4.9-W3.9-P1.27-LS6.0-BL 45.594,15.069 r0 top
U21 "mof5ws-100Ω±5%t" RES-TH_BD6.0-L17.5-P21.50-D0.7 32.894,71.076 r0 top value=100Ω
ZD1 "BZD52C5V" SOD-123_L2.7-W1.6-LS3.7-RD 25.782,30.944 r270 bottom
ZD3 "BZT52C51" SOD-123_L2.7-W1.6-LS3.7-RD 76.895,73.397 r270 top

## Footprints (in the part's own frame and the unit in brackets; to place one, negate y for a bottom-side part, rotate by r counter-clockwise, add the part's x,y. Pads: shape width x height; smd on the part's side, far side on the other; paste and mask are expansions set on the pad)
4mmbanana [mm]
  round 2.3 hole 1.5: 1(-6.36,5.08) 2(3.8,5.08) 3(3.8,-5.08) 4(-6.36,-5.08)
  round 3.6 hole 2.5: 5(0,0)
  silkscreen extent -13.42,-6.32 5.58,6.48
C0603 [mm]
  rect 0.8x0.9 smd paste+0 mask+0.102: 1(-0.7,0) 2(0.7,0)
  silkscreen extent -1.39,-0.71 1.39,0.71
C0805 [mm]
  rect 1.41x1.35 smd paste-100 mask+0.051: 1(-1,0) 2(1,0)
  silkscreen extent -1.96,-0.9 1.96,0.9
CAP-TH_BD8.0-P3.50-D0.5-FD [mil] "直插"
  round 63 hole 39.4: 1(-68.9,0) 2(68.9,0)
  silkscreen extent -156,-158 159,157
CONN-TH_8P-P4.20_CJT_C4201WR-2X4P [mm]
  rect 3x3 hole 2: 1(-6.3,-2.75)
  round 3 hole 2: 2(-2.1,-2.75) 3(2.1,-2.75) 4(6.3,-2.75) 5(6.3,2.75) 6(2.1,2.75) 7(-2.1,2.75) 8(-6.3,2.75)
  silkscreen extent -9,-16.65 9,-3.85
CONN-TH_C4201WR-2X8P [mm]
  round 3 hole 2: 1(-14.7,2.75) 2(-10.5,2.75) 3(-6.3,2.75) 4(-2.1,2.75) 5(2.1,2.75) 6(6.3,2.75) 7(10.5,2.75) 8(14.7,2.75) 9(-14.7,-2.75) 10(-10.5,-2.75) 11(-6.3,-2.75) 12(-2.1,-2.75) 13(2.1,-2.75) 14(6.3,-2.75) 15(10.5,-2.75) 16(14.7,-2.75)
  silkscreen extent -17.4,2.75 17.4,15.55
FUSE-SMD_L10.5-W5.1 [mm]
  rect 4.239x3.81 smd paste+0 mask+0: 1(-3.185,0) 2(3.185,0)
  silkscreen extent -5.4,-2.7 5.4,2.7
HDR-TH_1P-P2.54-V-M [mm]
  rect 1.7x1.7 hole 1.1: 1(0,0)
  silkscreen extent -1.27,-1.27 1.27,1.27
HDR-TH_2P-P2.54-V-M [mm]
  rect 2x2 hole 1.2 paste-2539.97: 1(-1.27,0)
  round 2 hole 1.2 paste-2539.97: 2(1.27,0)
  silkscreen extent -2.54,-1.27 2.54,1.27
HTSSOP-28_L9.7-W4.4-P0.65-LS6.4-BL-EP [mil]
  oval 13.5x68.2 smd: 1(-166.3,-112.8) 2(-140.7,-112.8) 3(-115.1,-112.8) 4(-89.6,-112.8) 5(-64,-112.8) 6(-38.4,-112.8) 7(-12.8,-112.8) 8(12.8,-112.8) 9(38.4,-112.8) 10(64,-112.8) 11(89.6,-112.8) 12(115.2,-112.8) 13(140.8,-112.8) 14(166.4,-112.8) 15(166.4,112.8) 16(140.8,112.8) 17(115.2,112.8) 18(89.6,112.8) 19(64,112.8) 20(38.4,112.8) 21(12.8,112.8) 22(-12.8,112.8) 23(-38.4,112.8) 24(-64,112.8) 25(-89.6,112.8) 26(-115.1,112.8) 27(-140.7,112.8) 28(-166.3,112.8)
  rect 220.5x122 smd paste+0 mask+2: 29(0,0)
  silkscreen extent -197,-119 194,70
IDC-TH_20P-P2.54-V-R2-C10-S2.54 [mm]
  rect 1.801x1.801 hole 1.1: 1(-11.43,-1.27)
  round 1.801 hole 1.1: 2(-11.43,1.27) 3(-8.89,-1.27) 4(-8.89,1.27) 5(-6.35,-1.27) 6(-6.35,1.27) 7(-3.81,-1.27) 8(-3.81,1.27) 9(-1.27,-1.27) 10(-1.27,1.27) 11(1.27,-1.27) 12(1.27,1.27) 13(3.81,-1.27) 14(3.81,1.27) 15(6.35,-1.27) 16(6.35,1.27) 17(8.89,-1.27) 18(8.89,1.27) 19(11.43,-1.27) 20(11.43,1.27)
  silkscreen extent -16.5,-4.52 16.5,4.4
IND-SMD_3P-L15.5-W15.5-L [mil]
  rect 137.8x106.3 smd: 1(-283.5,0)
  rect 137.8x133.9 smd: 2(283.5,-189) 3(283.5,189)
  silkscreen extent -305,-305 305,305
IND-SMD_L7.3-W6.8 [mil]
  rect 92.5x137.8 smd: 1(-118.1,0) 2(118.1,0)
  silkscreen extent -138,-130 138,130
LED0603-RD_RED [mm]
  rect 0.8x0.8 smd paste+0 mask+0.102: 1(-0.8,-0.003) 2(0.8,0.003)
  silkscreen extent -1.49,-0.75 1.39,0.76
PDFN-8_L5.8-W5.1-P1.27-LS6.1-BL [mil]
  rect 22.8x42.5 smd paste-3937 mask+2: 1(-75,-111.6) 2(-25,-111.6) 3(25,-111.6) 4(75,-111.6) 5(74.8,111.6) 6(25.2,111.6) 7(-24.8,111.6) 8(-74.8,111.6)
  rect 181.1x161.4 smd paste-3937 mask+2: 9(0,27.3)
  silkscreen extent -116,-141 102,114
R0603 [mm]
  rect 0.806x0.864 smd paste-100 mask+0.051: 1(-0.753,0) 2(0.753,0)
  silkscreen extent -1.39,-0.66 1.39,0.66
RES-ARRAY-SMD_0603-8P-L3.2-W1.6-BL [mil]
  rect 25.6x31.5 smd: 1(-47.2,-31.5) 4(47.3,-31.5) 5(47.3,31.5) 8(-47.2,31.5)
  rect 19.7x31.5 smd: 2(-15.7,-31.5) 3(15.8,-31.5) 6(15.8,31.5) 7(-15.7,31.5)
  silkscreen extent -74,-57 74,58
RES-SMD_L6.4-W3.2-1 [mil]
  rect 98.4x133.9 smd: 1(-122,0) 2(122.1,0)
  silkscreen extent -184,-85 185,80
RES-TH_BD6.0-L17.5-P21.50-D0.7 [mil]
  round 74 hole 43.31: 1(-427.17,0) 2(427.16,0)
  silkscreen extent -348,-118 348,118
SMA_L4.3-W2.6-LS5.0-FD [mm]
  rect 1.801x1.621 smd: 1(-2.151,-0.008) 2(2.149,0.01)
  silkscreen extent -2.17,-1.32 2.18,1.29
SO-8_L4.9-W3.9-P1.27-LS6.0-BL [mil]
  rect 23.6x70.9 smd paste+0 mask+2: 1(-75,-96.5) 2(-25,-96.5) 3(25,-96.5) 4(75,-96.5) 5(75,96.5) 6(25,96.5) 7(-25,96.5) 8(-75,96.5)
  silkscreen extent -136,-81 100,75
SOD-123_L2.7-W1.6-LS3.7-RD [mil] "BZT52C"
  rect 35.8x48 smd: 1(-64.4,0) 2(64.4,0)
  silkscreen extent -63,-39 54,39
SOD-523_L1.2-W0.8-LS1.6-FD [mil] "1N4148WT_C7420320"
  rect 19.7x23.6 smd: 1(-27.6,0) 2(27.5,0)
  silkscreen extent -26,-18 26,18
SOIC-8_L4.9-W3.9-P1.27-LS6.0-BL [mm]
  oval 0.588x2.045 smd paste+0: 1(-1.905,-2.772) 2(-0.635,-2.772) 3(0.635,-2.772) 4(1.905,-2.772) 5(1.905,2.772) 6(0.635,2.772) 7(-0.635,2.772) 8(-1.905,2.772)
  silkscreen extent -2.8,-2.92 2.53,1.52
SOIC-8_L5.0-W4.0-P1.27-LS6.0-BL-EP2.0 [mm]
  oval 0.574x2.038 smd: 1(-1.905,-2.769) 2(-0.635,-2.769) 3(0.635,-2.769) 4(1.905,-2.769) 5(1.905,2.769) 6(0.635,2.769) 7(-0.635,2.769) 8(-1.905,2.769)
  rect 2x2 smd: 9(0,0)
  silkscreen extent -2.79,-2.92 2.53,1.52
SOIC-16_L9.9-W3.9-P1.27-LS6.0-BL [mm]
  oval 0.602x1.971 smd: 1(-4.445,-2.736) 2(-3.175,-2.736) 3(-1.905,-2.736) 4(-0.635,-2.736) 5(0.635,-2.736) 6(1.905,-2.736) 7(3.175,-2.736) 8(4.445,-2.736) 9(4.445,2.736) 10(3.175,2.736) 11(1.905,2.736) 12(0.635,2.736) 13(-0.635,2.736) 14(-1.905,2.736) 15(-3.175,2.736) 16(-4.445,2.736)
  silkscreen extent -5.36,-2.81 5.03,1.52
SOT-23-3_L2.9-W1.3-P1.90-LS2.4-BR [mm] "MMBT3906"
  rect 1.25x0.7 smd: 1(1,-0.95) 2(1,0.95) 3(-1,0)
  silkscreen extent -0.73,-1.53 0.73,1.53
"SOT-23-3_L2.9-W1.3-P1.90-LS2.4-BR - duplicate" [mm] "3904"
  rect 1.001x0.65 smd: 1(0.998,-0.95) 2(0.998,0.95) 3(-1.001,0)
  silkscreen extent -0.73,-1.53 0.72,1.53
SOT-23-5_L3.0-W1.7-P0.95-LS2.8-BL [mm]
  rect 0.49x1.157 smd paste+0 mask+0.102: 1(-0.95,-1.154) 2(0,-1.154) 3(0.95,-1.154)
  rect 0.49x1.175 smd paste+0 mask+0.102: 4(0.95,1.154) 5(-0.95,1.154)
  silkscreen extent -1.8,-1.29 1.53,0.85
SOT-23-5_L3.0-W1.7-P0.95-LS2.8-BR [mm]
  rect 1.1x0.6 smd paste+0 mask+0.102: 1(1.3,-0.95) 2(1.3,0) 3(1.3,0.95) 4(-1.3,0.95) 5(-1.3,-0.95)
  silkscreen extent -0.9,-1.55 0.9,1.55
SOT-323-3_L2.0-W1.3-P1.30-LS2.1-BR [mm]
  rect 0.937x0.5 smd: 1(0.897,-0.65) 2(0.897,0.65) 3(-0.899,0)
  silkscreen extent -0.7,-1.13 0.7,1.13
SSOP-28_L10.2-W5.3-P0.65-LS7.8-BL [mil]
  oval 14.3x79.3 smd: 1(-166.4,-136) 2(-140.8,-136) 3(-115.2,-136) 4(-89.6,-136) 5(-64,-136) 6(-38.4,-136) 7(-12.8,-136) 8(12.8,-136) 9(38.4,-136) 10(64,-136) 11(89.6,-136) 12(115.1,-136) 13(140.7,-136) 14(166.3,-136) 15(166.3,136) 16(140.7,136) 17(115.1,136) 18(89.6,136) 19(64,136) 20(38.4,136) 21(12.8,136) 22(-12.8,136) 23(-38.4,136) 24(-64,136) 25(-89.6,136) 26(-115.2,136) 27(-140.8,136) 28(-166.4,136)
  silkscreen extent -200,-87 200,87
TO-252-2_L6.6-W6.1-P4.57-LS9.9-BR-CW [mil]
  rect 118.1x63 smd: 1(134.8,-90.2) 3(134.8,90.2)
  rect 244.1x228.3 smd: 2(-134.9,0)
  silkscreen extent -181,-132 54,132
TO-252-2_L6.6-W6.1-P4.58-TL [mil]
  rect 118.1x63 smd: 1(-141.3,90) 3(-141.3,-90)
  rect 244.1x228.3 smd: 2(141.3,1)
  silkscreen extent -151,-134 179,161
TSSOP-16_L5.0-W4.4-P0.65-LS6.4-BL [mil]
  oval 13.5x68.2 smd: 1(-89.5,-112.8) 2(-63.9,-112.8) 3(-38.3,-112.8) 4(-12.7,-112.8) 5(12.8,-112.8) 6(38.4,-112.8) 7(64,-112.8) 8(89.6,-112.8) 9(89.6,112.9) 10(64,112.9) 11(38.4,112.9) 12(12.8,112.9) 13(-12.7,112.9) 14(-38.3,112.9) 15(-63.9,112.9) 16(-89.5,112.9)
  silkscreen extent -120,-119 102,70
VSSOP-8_L2.3-W2.0-P0.50-LS3.1-BL [mil]
  oval 11x35.6 smd: 1(-29.5,-55.2) 2(-9.8,-55.2) 3(9.9,-55.2) 4(29.6,-55.2) 5(29.6,55.3) 6(9.9,55.3) 7(-9.8,55.3) 8(-29.5,55.3)
  silkscreen extent -54,-49 42,28
VSSOP-8_L3.0-W3.0-P0.65-LS5.0-BL [mm]
  oval 0.364x1.662 smd: 1(-0.975,-2.131) 2(-0.325,-2.131) 3(0.325,-2.131) 4(0.975,-2.131) 5(0.975,2.131) 6(0.325,2.131) 7(-0.325,2.131) 8(-0.975,2.131)
  silkscreen extent -1.76,-2.28 1.58,1.07
WSON-12_L3.0-W2.0-P0.50-BL-EP [mil]
  rect 11x19.7 smd: 1(-49.2,-37) 2(-29.5,-37) 3(-9.8,-37) 4(9.8,-37) 5(29.5,-37) 6(49.2,-37) 7(49.2,37) 8(29.5,37) 9(9.8,37) 10(-9.8,37) 11(-29.5,37) 12(-49.2,37)
  round 17.7 smd: 13(0,0)
  Top Layer 1 region: -41.3,17.7 -41.3,11.8 -66.9,11.8 -66.9,3.9 -41.3,3.9 -41.3,-3.9 -66.9,-3.9 -66.9,-11.8 -41.3,-11.8 -41.3,-17.7 41.3,-17.7 41.3,-11.8 66.9,-11.8 66.9,-3.9 41.3,-3.9 41.3,3.9 66.9,3.9 66.9,11.8 41.3,11.8 41.3,17.7 -41.3,17.7
  silkscreen extent -69,-61 61,54

## Part data
C1 C2 C3 C4 C5 C6 C7 C8 C9 C10 C21 C22 C23 C24 C25 C26 C29 C36 C37 C38 C39 C40 C41 C42 C43 C46 C48 C50 C52 C53 C54 C55 C56 C57 C58 C59 C62 C63 C73 C74 C75 C77 C78 C79 C80 C81 C82 C84 C85 C86 C88 C89 C90 C91 C92 C93 C94 C95 C96 C97 C98 C99 C100 C101 C102 C103 C104 C105 C106 C107 C108 C109 C110 C111 C112 C113 C114 C115 C116 C117 C118 C119 C120 C121 C122 C123 C124 C127 C128 C129 C130 C133 C134 C137 C138: library part C0603, "Capacitor", LatestRevisionDate=17-Jul-2002, LatestRevisionNote="Re-released for DXP Platform.", Published=8-Jun-2000, Publisher="Altium Limited"
C11 C13 C16 C17 C18 C20 C34 C44 C45 C61 C64 C76 C83: library part C0805, "Capacitor", LatestRevisionDate=17-Jul-2002, LatestRevisionNote="Re-released for DXP Platform.", Published=8-Jun-2000, Publisher="Altium Limited"
C12 C14 C15 C19 C136: library part CAP_EC_1, "贴片铝电解电容（RVT1V101M0607）"
C65 C69 C140: library part C0603, "CAP CER 0.1UF 25V, 10% X7R 0603", LatestRevisionDate=17-Jul-2002, LatestRevisionNote="Re-released for DXP Platform.", Published=8-Jun-2000, Publisher="Altium Limited"
C66 C68 C70 C139: library part C0603, "CAP CER 1UF 25V, 10% X7R 0603", LatestRevisionDate=17-Jul-2002, LatestRevisionNote="Re-released for DXP Platform.", Published=8-Jun-2000, Publisher="Altium Limited"
C67 C71 C72 C141: library part C0603, "CAP CER 10UF 25V, 10% X7R 0603", LatestRevisionDate=17-Jul-2002, LatestRevisionNote="Re-released for DXP Platform.", Published=8-Jun-2000, Publisher="Altium Limited"
CN1: "插针结构:2x10P;间距:2.54mm;安装方式:直插;总PIN数:20P;排数:2;每排PIN数:10;行距:2.54mm;额定电流:3A;触头材质:黄铜;触头镀层:金;工作温度:-40℃~+105℃;", Color=黑色, Current Rating=3A, Flame Retardant Rating=UL94V-0, JLCPCB Part Class="Extended Part", LCSC Part Name="2x10P 间距:2.54mm 直插", Manufacturer=Sullins, ManufacturerPart=SBH11-PBPC-D10-ST-BK, Operating Temperature=-40℃~+105℃, AddInBom=yes, Contact Material=黄铜, Contact Plating=金, ConvertToPcb=yes, Datasheet=https://item.szlcsc.com/datasheet/SBH11-PBPC-D10-ST-BK/18666954.html, FootprintName=IDC-TH_20P-P2.54-V-R2-C10-S2.54, ModelId=919cb9b113224b379d0081fecd8b0ef1, ModelName=IDC-TH_20P-P2.54-V-R2-C10-S2.54, ModelTransform=1299.21,358.267,0,0,0,0,0,5.906,-118.11, Mounting Type=直插, Number of Pins=20P, Number of PINs Per Row=10, Number of Rows=2, Pins Structure=2x10P, Pitch=2.54mm, Row Spacing=2.54mm, Supplier=LCSC, Supplier Footprint=插件, SupplierPart=C17537739, Symbol=SBH11-PBPC-D10-ST-BK
CN2: "插针结构:2x8P;间距:4.2mm;安装方式:弯插;参考系列:-;总PIN数:16P;排数:2;每排PIN数:8;行距:4.2mm;额定电流:13A;触头材质:黄铜;触头镀层:锡;工作温度:-40℃~+105℃;", Color=-, Current Rating=13A, Flame Retardant Rating=UL94V-2, JLCPCB Part Class="Extended Part", LCSC Part Name="2x8P 间距:4.2mm 弯插", Manufacturer=CJT(长江连接器), ManufacturerPart=C4201WR-2x8P, Operating Temperature=-40℃~+105℃, Voltage Rating=600V, AddInBom=yes, Contact Material=黄铜, Contact Plating=锡, ConvertToPcb=yes, Datasheet=https://item.szlcsc.com/datasheet/C4201WR-2x8P/238606.html, FootprintName=CONN-TH_C4201WR-2X8P, ModelId=521ba02425c74688a42912bee7d757d4, ModelName=CONN-TH_C4201WR-2X8P, ModelTransform=1385.824,772.046,0,0,0,0,-7.874,255.906,-137.795, Mounting Type=弯插, Number of Pins=16P, Number of PINs Per Row=8, Number of Rows=2, Pins Structure=2x8P, Pitch=4.2mm, Plastic Material=PA66, Reference Series=-, Row Spacing=4.2mm, Supplier=LCSC, Supplier Footprint=弯插,P=4.2mm, SupplierPart=C239502, Symbol=C4201WR-2X8P
D1 D2 D3 D17: library part ss34_c7420365, "二极管配置:独立式;正向压降(Vf):550mV@3A;直流反向耐压(Vr):40V;整流电流:3A;", Current - Rectified=3A, JLCPCB Part Class="Extended Part", LCSC Part Name="电压:40V 电流:3A", Manufacturer=R+O(宏嘉诚), ManufacturerPart=SS34, Reverse Leakage Current (Ir)=200uA@40V, Voltage - DC Reverse(Vr)=40V, Voltage - Forward(Vf@If)=550mV@3A, AddInBom=yes, ConvertToPcb=yes, Datasheet=https://item.szlcsc.com/datasheet/SS34/8397187.html, Diode Configuration=独立式, FootprintName=SMA_L4.3-W2.6-LS5.0-FD, ModelId=7e24bebe6cd74171ae8c9de6fc5b78aa, ModelName=SMA_L4.3-W2.6-LS5.0-FD, ModelTransform=198.4248,103.5431,0,180,0,0,-0.001,0,0, Supplier=LCSC, Supplier Footprint=SMA(DO-214AC), SupplierPart=C7420365, Symbol=SS34_C7420365
D5 D6 D8 D9 D11 D13 D18: "二极管配置:独立式;整流电流:150mA;直流反向耐压(Vr):100V;正向压降(Vf):1.25V@150mA;反向恢复时间(Trr):4ns;", Current - Rectified=150mA, JLCPCB Part Class="Extended Part", LCSC Part Name="100V 150mA", Manufacturer=R+O(宏嘉诚), Non-Repetitive Peak Forward Surge Current=2A, Operating Junction Temperature Range=-55℃~+150℃, Pd - Power Dissipation=150mW, Reverse Leakage Current (Ir)=1uA@75V, Voltage - DC Reverse(Vr)=100V, Voltage - Forward(Vf@If)=1.25V@150mA, AddInBom=yes, ConvertToPcb=yes, Datasheet=https://item.szlcsc.com/datasheet/1N4148WT/8397142.html, Diode Configuration=独立式, FootprintName=SOD-523_L1.2-W0.8-LS1.6-FD, ManufacturerPart=1N4148WT, ModelId=8f56a03db567494d8f4c9d12aa52a741, ModelName=SOD-523_L1.2-W0.8-H0.7-LS1.6, ModelTransform=62.992,31.496,0,0,0,0,0,0,0, Reverse Recovery Time (trr)=4ns, Supplier=LCSC, Supplier Footprint=SOD-523, SupplierPart=C7420320, Symbol=1N4148WT_C7420320
F1 F2: "保险丝座类型:支座型;通道数:1;保险丝类型:长方体;", Current Rating=15A, JLCPCB Part Class="Extended Part", LCSC Part Name="15A 500V 支座型", Manufacturer=XFCN(兴飞), ManufacturerPart=XF-155, Voltage Rating=500V, AddInBom=yes, ConvertToPcb=yes, Datasheet=https://item.szlcsc.com/datasheet/XF-155/43135981.html, FootprintName=FUSE-SMD_L10.5-W5.1, Fuse Length=6.1mm, Fuse Type=长方体, Fuse Width=2.5mm, Fuseholder Type=支座型, Number of Circuits=1, Supplier=LCSC, Supplier Footprint=SMD, SupplierPart=C41371860, Symbol=XF-155
H4: Color=黑色, Current Rating=-, JLCPCB Part Class="Extended Part", LCSC Part Name="1x1P 间距:2.54mm 方针 直插", Manufacturer=XFCN(兴飞), Operating Temperature=-40℃~+105℃, Add into BOM=yes, Circluar Pins/Square Pins=方针, Contact Material=黄铜, Contact Plating=-, Convert to PCB=yes, Datasheet=https://atta.szlcsc.com/upload/public/pdf/source/20200309/C492400_46876A5B545F5AE6B8D4A09C46E276E8.pdf, Device=PZ254V-11-01P, Insulation Height=2.5mm, Length of End Connection Pin=3mm, Length of Mating Pin=6mm, Manufacturer Part=PZ254V-11-01P, Mounting Type=直插, Number of Pins=1P, Number of Rows=单排, Pin Structure=1x1P, Pitch=2.54mm, Row Spacing=-, Supplier=LCSC, Supplier Footprint=插件,P=2.54mm, Supplier Part=C492400, Symbol=PZ254V-11-01P, Voltage Rating (Max)=-
H6 H7: "插针结构:1x2P;间距:2.54mm;行距:-;圆针/方针:方针;安装方式:直插;排数:单排;总PIN位数:2P;额定电流:3A;额定电压:250V;配合针长度:6mm;塑高:2.5mm;端接针长度:3mm;触头材质:黄铜;触头镀层:-;工作温度:-40℃~+105℃;颜色:黑色;", Color=黑色, Current Rating=3A, JLCPCB Part Class="Extended Part", LCSC Part Name="1x2P 间距:2.54mm 方针 直插", Manufacturer=XFCN(兴飞), ManufacturerPart=PZ254V-11-02P, Operating Temperature=-40℃~+105℃, Voltage Rating (Max)=250V, AddInBom=yes, Circluar Pins/Square Pins=方针, Contact Material=黄铜, Contact Plating=-, ConvertToPcb=yes, Datasheet=https://item.szlcsc.com/datasheet/PZ254V-11-02P/502957.html, FootprintName=HDR-TH_2P-P2.54-V-M, Insulation Height=2.5mm, Length of End Connection Pin=3mm, Length of Mating Pin=6mm, ModelId=e35305ec3aa84b66b849f914b715e73f, ModelName=HDR2.54-M-LI-1X2P, ModelTransform=200,100,0,0,0,0,0,0,-118.11, Mounting Type=直插, Number of Pins=2P, Number of Rows=单排, Pin Structure=1x2P, Pitch=2.54mm, Row Spacing=-, Supplier=LCSC, Supplier Footprint=插件,P=2.54mm, SupplierPart=C492401, Symbol=PZ254V-11-02P
L1: library part cdep15d90t150np-4r7mc-125, "适用于高耐压(直流120V)和大电流。磁屏蔽。符合AEC Q200标准。工作温度范围:-40°C至+150°C(包括线圈自身温升)", DC Resistance (DCR)=3.5mΩ, JLCPCB Part Class="Extended Part", LCSC Part Name="4.7uH ±20% 21.3A", Manufacturer=Sumida(胜美达), ManufacturerPart=CDEP15D90T150NP-4R7MC-125, Rated Current=16.5A, Ratings=AEC-Q200, Saturation Current (Isat)=21.3A, Tolerance=±20%, AddInBom=yes, ConvertToPcb=yes, Datasheet=https://atta.szlcsc.com/upload/public/pdf/source/20180612/C171581_D70A455BA7744A0B5218E235967B6B52.pdf, FootprintName=IND-SMD_3P-L15.5-W15.5-L, ModelId=109db49b485b4137a89608c2501f93a1, ModelName=IND-SMD_3P-L15.5-W15.5-H10.0-L, ModelTransform=611.022,610.235,0,180,0,0,0,0,0, Supplier=LCSC, Supplier Footprint=SMD-3P,15.5x15.5mm, SupplierPart=C171579, Symbol=CDEP15D90T150NP-4R7MC-125
L2: "电感值:10uH;精度:±20%;额定电流:4.5A;饱和电流(Isat):5.5A;类型:一体成型电感;", Current - Saturation(Isat)=5.5A, Current Rating=4.5A, DC Resistance(DCR)=68mΩ, JLCPCB Part Class="Extended Part", LCSC Part Name="10uH ±20% 5.5A", Manufacturer=cjiang(长江微电), ManufacturerPart=FXL0630-100-M, Ratings=-, Tolerance=±20%, AddInBom=yes, ConvertToPcb=yes, Datasheet=https://item.szlcsc.com/datasheet/FXL0630-100-M/178606.html, FootprintName=IND-SMD_L7.3-W6.8, ModelId=e28854526ca747668ea12fbe1dd39a63, ModelName=IND-SMD_L7.3-W6.8-H3.0, ModelTransform=292.125,267.716,0,0,0,0,0,0,0, Supplier=LCSC, Supplier Footprint=SMD,7x6.6mm, SupplierPart=C167223, Symbol=FXL0630-100-M, Type=一体成型电感
Q1 Q3 Q5 Q6: library part apg077n01g, "数量:-;漏源电压(Vdss):100V;连续漏极电流(Id):90A;导通电阻(RDS(on)):7.7mΩ@10V;耗散功率(Pd):105W;阈值电压(Vgs(th)):3V@250uA;", Current - Continuous Drain(Id)=90A, Drain to Source Voltage=100V, Gate Threshold Voltage (Vgs(th))=3V@250uA, Input Capacitance(Ciss)=3nF, JLCPCB Part Class="Extended Part", LCSC Part Name=N沟道,电流:90A,耐压:100V, Manufacturer=ALLPOWER(铨力), Operating Temperature=-55℃~+150℃, Output Capacitance(Coss)=362pF, Pd - Power Dissipation=105W, Reverse Transfer Capacitance (Crss@Vds)=11pF, AddInBom=yes, ConvertToPcb=yes, Datasheet=https://item.szlcsc.com/datasheet/APG077N01G/3021876.html, FootprintName=PDFN-8_L5.8-W5.1-P1.27-LS6.1-BL, Gate Charge(Qg)=30nC@10V, ManufacturerPart=APG077N01G, ModelId=178189b27e7544aca50c111426555358, ModelName=PDFN-8_L4.9-W5.8-H1.0-P1.27, ModelTransform=200.787,240.157,0,0,0,0,0,0,0, Number=-, RDS(on)=7.7mΩ@10V, Supplier=LCSC, Supplier Footprint=PDFN-8(5x6), SupplierPart=C2840980, Symbol=APG077N01G, Type=N沟道
Q2 Q10 Q11: "数量:1个N沟道;漏源电压(Vdss):40V;连续漏极电流(Id):45A;导通电阻(RDS(on)):11mΩ;耗散功率(Pd):20W;阈值电压(Vgs(th)):2V;", Current - Continuous Drain(Id)=45A, Drain to Source Voltage=40V, Gate Threshold Voltage (Vgs(th))=2V, JLCPCB Part Class="Extended Part", LCSC Part Name="1个N沟道 耐压:40V 电流:45A", Manufacturer=HL(富海微), ManufacturerPart=50N04, Operating Temperature=-55℃~+150℃, Pd - Power Dissipation=20W, AddInBom=yes, ConvertToPcb=yes, Datasheet=https://item.szlcsc.com/datasheet/50N04/8649544.html, FootprintName=TO-252-2_L6.6-W6.1-P4.57-LS9.9-BR-CW, Gate Charge(Qg)=22.9nC@10V, ModelId=ce57f84d66384067af8a68020b6de06d, ModelName=TO-252-2L-3P_L6.6-W6.1-H2.3-LS10.1-P4.6, ModelTransform=259.842,390.52442,0,90,0,0,-39.39,0,0, Number=1个N沟道, RDS(on)=11mΩ, Supplier=LCSC, Supplier Footprint=TO-252, SupplierPart=C7543827, Symbol=50N04, Type=N沟道
Q4 Q7 Q9 Q13 Q14: library part 2n7002_c7420321, "数量:1个N沟道;漏源电压(Vdss):60V;连续漏极电流(Id):115mA;导通电阻(RDS(on)):900mΩ@10V;耗散功率(Pd):225mW;阈值电压(Vgs(th)):1.6V;", Current - Continuous Drain(Id)=115mA, Drain to Source Voltage=60V, Gate Threshold Voltage (Vgs(th))=1.6V, Input Capacitance(Ciss)=50pF, JLCPCB Part Class="Extended Part", LCSC Part Name=N沟道,电流:115mA,耐压:60V, Manufacturer=R+O(宏嘉诚), ManufacturerPart=2N7002, Operating Temperature=-55℃~+150℃, Output Capacitance(Coss)=25pF, Pd - Power Dissipation=225mW, Reverse Transfer Capacitance (Crss@Vds)=5pF, AddInBom=yes, ConvertToPcb=yes, Datasheet=https://item.szlcsc.com/datasheet/2N7002/8397143.html, FootprintName=SOT-23-3_L2.9-W1.3-P1.90-LS2.4-BR, Gate Charge(Qg)=1.6nC@10V, ModelId=c62791f0466c4ae2a892c056b845b0ca, ModelName=SOT-23-3P_L2.9-W1.3-H1.0-LS2.4-P0.95, ModelTransform=98.425,114.173,0,180,0,0,0.0005,-0.0005,0, Number=1个N沟道, RDS(on)=900mΩ@10V, Supplier=LCSC, Supplier Footprint=SOT-23, SupplierPart=C7420321, Symbol=2N7002_C7420321, Type=N沟道
Q8 Q12: "数量:1个P沟道;漏源电压(Vdss):50V;连续漏极电流(Id):-;导通电阻(RDS(on)):6Ω@5V;耗散功率(Pd):200mW;阈值电压(Vgs(th)):1.6V;", Current - Continuous Drain(Id)=-, Drain to Source Voltage=50V, Gate Threshold Voltage (Vgs(th))=1.6V, Input Capacitance(Ciss)=45pF, JLCPCB Part Class="Extended Part", LCSC Part Name=BSS84PW(TP), Manufacturer="TECH PUBLIC(台舟)", Operating Temperature=-55℃~+150℃, Output Capacitance(Coss)=25pF, Pd - Power Dissipation=200mW, Reverse Transfer Capacitance (Crss@Vds)=12pF, AddInBom=yes, Configuration=-, ConvertToPcb=yes, Datasheet=https://item.szlcsc.com/datasheet/BSS84PW(TP)/56444021.html, FootprintName=SOT-323-3_L2.0-W1.3-P1.30-LS2.1-BR, Gate Charge(Qg)=-, ManufacturerPart=BSS84PW(TP), ModelId=59529c0d6fc749f28f2d0659e12986b4, ModelName=SOT-323-3_L2.0-W1.3-H1.0-LS2.1-P1.30, ModelTransform=78.74,82.677,0,90,0,0,0.0005,0,0, Number=1个P沟道, RDS(on)=6Ω@5V, Supplier=LCSC, Supplier Footprint=SOT-323, SupplierPart=C53340809, Symbol=BSS84PW(TP), Type=P沟道, Vgs=±20V
R1 R2 R3 R4 R5 R6 R7 R8 R9 R15 R16 R17 R18 R20 R21 R22 R23 R24 R25 R26 R28 R30 R31 R40 R41 R42 R43 R47 R53 R54: library part 0603-3KΩ-5%, "片式电阻", 物料号=NA, 物料描述=片式电阻器-0805-10KΩ-5%-JT
R10 R11 R12 R13 R19 R32 R33 R75 R83 R85 R91 R120: library part 0603-1KΩ-5%, "片式电阻", 物料号=NA, 物料描述=片式电阻器-0805-10KΩ-5%-JT
R14 R27 R34 R35 R36 R37 R38 R39 R44 R45 R46 R48 R50 R51 R52 R55 R57 R58 R59 R61 R62 R63 R64 R65 R67 R68 R69 R70 R71 R72 R73 R74 R76 R77 R78 R80 R81 R82 R86 R87 R88 R89 R90 R92 R94 R95 R96 R97 R98 R99 R100 R101 R102 R103 R104 R105 R106 R107 R108 R109 R110 R111 R112 R113 R114 R115 R116 R119 R121 R122 R123 R124: library part R0603, "Resistor", LatestRevisionDate=17-Jul-2002, LatestRevisionNote="Re-released for DXP Platform.", Published=8-Jun-2000, Publisher="Altium Limited"
R29 R79 R84: library part hollr2512-3w-2mr-1%, "电阻类型:采样电阻;阻值:2mΩ;精度:±1%;额定压降:-;功率:3W;温度系数:±50ppm/℃;安装方式:贴片;", JLCPCB Part Class="Extended Part", LCSC Part Name="2mΩ ±1% 3W", Manufacturer=Milliohm(毫欧), ManufacturerPart=HoLLR2512-3W-2mR-1%, Power(Watts)=3W, Rated Current=77.5A, Rated Output Voltage=-, Temperature Coefficient=±50ppm/℃, Tolerance=±1%, AddInBom=yes, ConvertToPcb=yes, Datasheet=https://atta.szlcsc.com/upload/public/pdf/source/20220330/9E8D3880B1628B3B70C68092C8A7E08B.pdf, FootprintName=RES-SMD_L6.4-W3.2-1, ModelId=2a92684014bd46c593e4aa7ce823c350, ModelName=RES-SMD_L6.4-W3.2-1, ModelTransform=251.968,125.984,0,0,0,0,0,0,0, Mounting Sytle=贴片, Supplier=LCSC, Supplier Footprint=2512, SupplierPart=C2994640, Symbol=HOLLR2512-3W-2MR-1%, Type=采样电阻
R49 R118: library part R0603, "薄膜电阻 249kΩ ±0.1% 100mW", LatestRevisionDate=17-Jul-2002, LatestRevisionNote="Re-released for DXP Platform.", Published=8-Jun-2000, Publisher="Altium Limited"
R117: library part R0603, "厚膜电阻 1kΩ ±1% 100mW", LatestRevisionDate=17-Jul-2002, LatestRevisionNote="Re-released for DXP Platform.", Published=8-Jun-2000, Publisher="Altium Limited"
RN1 RN2: "电阻器数:4;阻值:33Ω;精度:±5%;单个元件功率:62.5mW;温度系数:±200ppm/℃;", JLCPCB Part Class="Extended Part", LCSC Part Name="33Ω ±5%", Manufacturer=UNI-ROYAL(厚声), ManufacturerPart=4D03WGJ0330T5E, Number of Resistors=4, Power(Watts)=62.5mW, Temperature Coefficient=±200ppm/℃, Tolerance=±5%, AddInBom=yes, ConvertToPcb=yes, Datasheet=https://atta.szlcsc.com/upload/public/pdf/source/20191224/C474318_2527498AE30E813171187CCD28401A71.pdf, FootprintName=RES-ARRAY-SMD_0603-8P-L3.2-W1.6-BL, ModelId=edf39f9a2dca4b9a94267f442dd4f95a, ModelName=R0603-8P_L3.2-W1.6-H0.6, ModelTransform=125.984,62.992,0,0,0,0,0,0,0, Number of Pins=8, Supplier=LCSC, Supplier Footprint=0603x4, SupplierPart=C25508, Symbol=4D03WGJ0330T5E
U1: "功能类型:升降压型;工作电压:4.2V~55V;输出电压:800mV~55V;输出电流:2A;输出类型:可调;", Frequency - Switching=600kHz, JLCPCB Part Class="Extended Part", LCSC Part Name="升降压型 4.2V~55V", Manufacturer=TI(德州仪器), ManufacturerPart=LM5176PWPR, Operating Temperature=-40℃~+125℃@(TJ), Output Current=2A, Output Voltage=800mV~55V, Quiescent Current=2mA, Voltage - Supply=4.2V~55V, AddInBom=yes, ConvertToPcb=yes, Datasheet=https://www.ti.com/cn/lit/gpn/lm5176, Features=频率同步；逐波限流；可调软启动；过流保护；EMI优化(抖频模式)；打嗝限流, FootprintName=HTSSOP-28_L9.7-W4.4-P0.65-LS6.4-BL-EP, Function=升降压型, ModelId=c33b2f64442f42ecb27b91aed85c9e5a, ModelName=HTSSOP-28_L9.7-W4.4-P0.65-LS6.4-BL-EP, ModelTransform=381.889,251.968,0,0,0,0,0,0,0, Number of Outputs=1, Output Type=可调, Supplier=LCSC, Supplier Footprint=HTSSOP-28-EP, SupplierPart=C442493, Switch Tube (Built-In/External)=外置, Symbol=LM5176PWPR, Synchronous Rectifier=是, Topology=降压式；升压式
U2: library part tc77-3.3mcttr_1, "检测温度:-55℃~+125℃;精度:±1℃;接口类型:SPI;", Detection Temperature Range=-55℃~+125℃, JLCPCB Part Class="Extended Part", LCSC Part Name=带SPI接口的温度传感器, Manufacturer=MICROCHIP(美国微芯), ManufacturerPart=TC77-3.3MCTTR, Operating Temperature=-, standby current=1uA, Temperature Conversion Time=300ms, Temperature Resolution=13bit, Tolerance=±1℃, Voltage - Supply=2.7V~5.5V, AddInBom=yes, ConvertToPcb=yes, Datasheet=https://item.szlcsc.com/datasheet/TC77-3.3MCTTR/57645.html, FootprintName=SOT-23-5_L3.0-W1.7-P0.95-LS2.8-BL, Interface=SPI, ModelId=0a2a1b8f50944f73965918ad6e5fe167, ModelName=SOT-23-5_L2.9-W1.6-H1.1-LS2.8-P0.95, ModelTransform=118.60433,114.173,0,90,0,0,0.0005,0.0005,0, Supplier=LCSC, Supplier Footprint=SOT-23-5, SupplierPart=C56616, Symbol=TC77-3.3MCTTR
U3: "插针结构:2x4P;间距:4.2mm;安装方式:弯插;总PIN数:8P;排数:2;每排PIN数:4;额定电流:13A;触头材质:黄铜;触头镀层:锡;工作温度:-40℃~+105℃;", Color=透明色, Current Rating=13A, Flame Retardant Rating=UL94V-2, JLCPCB Part Class="Extended Part", LCSC Part Name="2x4P 间距:4.2mm 弯插", Manufacturer=CJT(长江连接器), ManufacturerPart=C4201WR-2x4P, Operating Temperature=-40℃~+105℃, Voltage Rating=600V, AddInBom=yes, Contact Material=黄铜, Contact Plating=锡, ConvertToPcb=yes, Datasheet=https://item.szlcsc.com/datasheet/C4201WR-2x4P/6094518.html, FootprintName=CONN-TH_8P-P4.20_CJT_C4201WR-2X4P, ModelId=4d4809cc7aa74aa0a0d297a6ab6683bc, ModelName=CONN-TH_8P-P4.20_CJT_C4201WR-2X4P, ModelTransform=709.0537,785.4315,0,0,0,0,-0.002,-261.811,-137.795, Mounting Type=弯插, Number of Pins=8P, Number of PINs Per Row=4, Number of Rows=2, Pins Structure=2x4P, Pitch=4.2mm, Plastic Material=PA66, Supplier=LCSC, Supplier Footprint=弯插,P=4.2mm, SupplierPart=C5333418, Symbol=C4201WR-2X4P_C5333418, Z-Height of the Board=9.6mm
U4: "输出极性:正极;工作电压:18V;输出电压:3.3V;输出电流:3A;电源纹波抑制比(PSRR):72dB@(120Hz);输出类型:固定;", JLCPCB Part Class="Extended Part", LCSC Part Name="3.3V 3A 18V", Manufacturer=UTC(友顺), ManufacturerPart=UZ1085L-33-TN3-R, Operating Temperature=-40℃~+85℃, Output Current=3A, Output Voltage=3.3V, Power Supply Rejection Ratio (PSRR)=72dB@(120Hz), standby current=4mA, Voltage - Supply=18V, Voltage Dropout=1.4V@(3A), AddInBom=yes, ConvertToPcb=yes, Datasheet=https://item.szlcsc.com/datasheet/UZ1085L-33-TN3-R/136900.html, Features=过流保护；热关断, FootprintName=TO-252-2_L6.6-W6.1-P4.58-TL, ModelId=ce57f84d66384067af8a68020b6de06d, ModelName=TO-252-2L-3P_L6.6-W6.1-H2.3-LS10.1-P4.6, ModelTransform=259.842,390.52442,0,270,0,0,31.494,-0.12,0, Noise=0.003%Vout, Number of Outputs=1, Output Configuration=正极, Output Type=固定, Supplier=LCSC, Supplier Footprint=TO-252-2(DPAK), SupplierPart=C125622, Symbol=UZ1085L-33-TN3-R
U5: "功能类型:降压型;工作电压:4.5V~28V;输出电压:800mV~25V;输出电流:3A;输出类型:可调;", Frequency - Switching=100kHz~1.5MHz, JLCPCB Part Class="Extended Part", LCSC Part Name="降压型 3A 4.5V~28V", Manufacturer=MPS(芯源), ManufacturerPart=MP1584EN-LF-Z, Operating Temperature=-20℃~+85℃@(TA), Output Current=3A, Output Voltage=800mV~25V, Quiescent Current=100uA, Voltage - Supply=4.5V~28V, AddInBom=yes, ConvertToPcb=yes, Datasheet=https://item.szlcsc.com/datasheet/MP1584EN-LF-Z/15724.html, Features=轻载高效模式；外部补偿；过流保护, FootprintName=SOIC-8_L5.0-W4.0-P1.27-LS6.0-BL-EP2.0, Function=降压型, ModelId=d3dfb165ce8644e793b750cd6f375e75, ModelName=SOIC-8_L5.0-W4.0-P1.27-LS6.0-BL-EP2.0, ModelTransform=192.913,236.22,0,0,0,0,0,0,0, Number of Outputs=1, Output Type=可调, Supplier=LCSC, Supplier Footprint=SOIC-8-EP, SupplierPart=C15051, Switch Tube (Built-In/External)=内置, Symbol=MP1584EN-LF-Z, Synchronous Rectifier=否, Topology=降压式